# Altium PCB VHF_AMP.PCBDOC (part 1 of 7)
Units mm, origin at the board's own origin, x right, y up, seen from the top; angles counter-clockwise.
Board outline 222.47 x 100.01 mm, 4 copper layers (Top Layer, Int1 (GND), Int2 (PWR), Bottom Layer), stack 1.508 mm thick; 513 components, 284 nets, 1695 pads, 984 vias.
Unrouted connection lines stored in the file: 110.
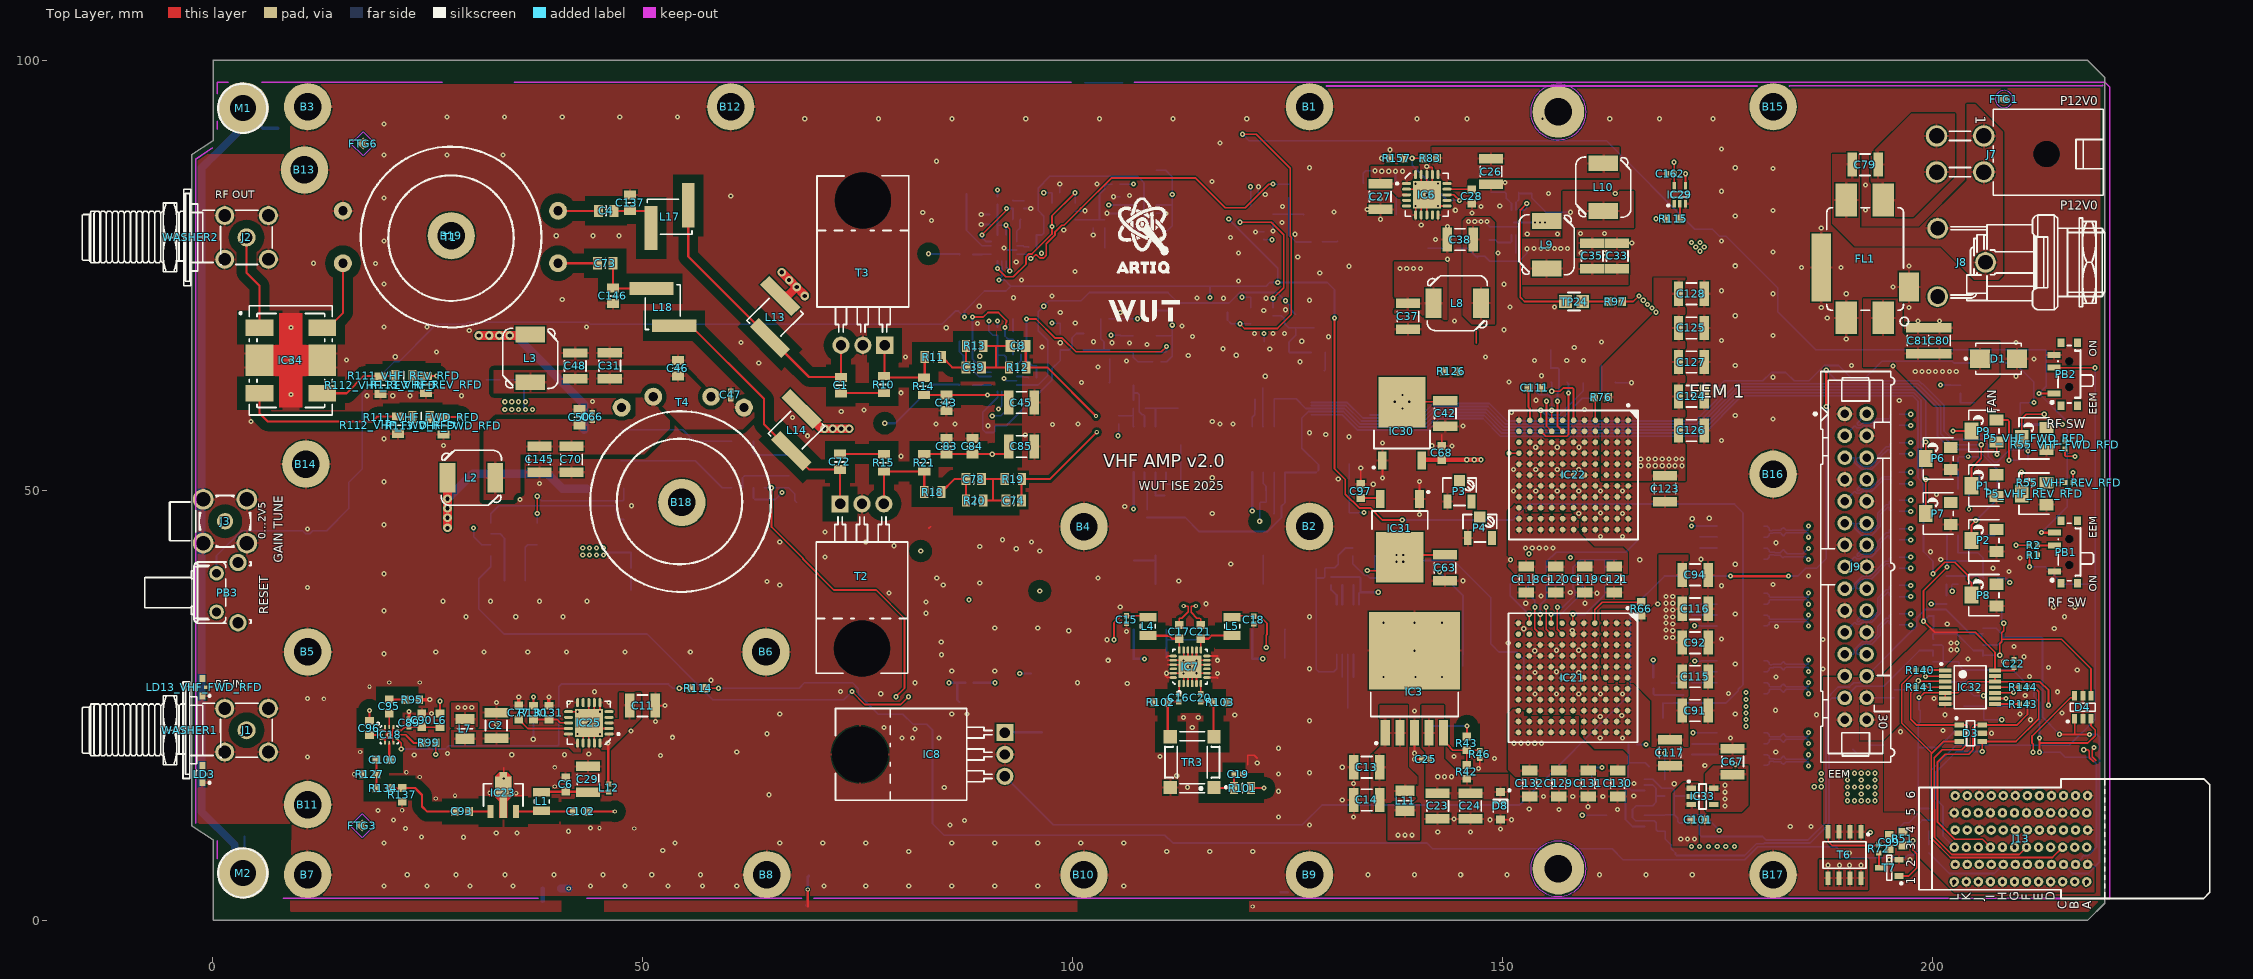
[diagram p0: Top Layer view]
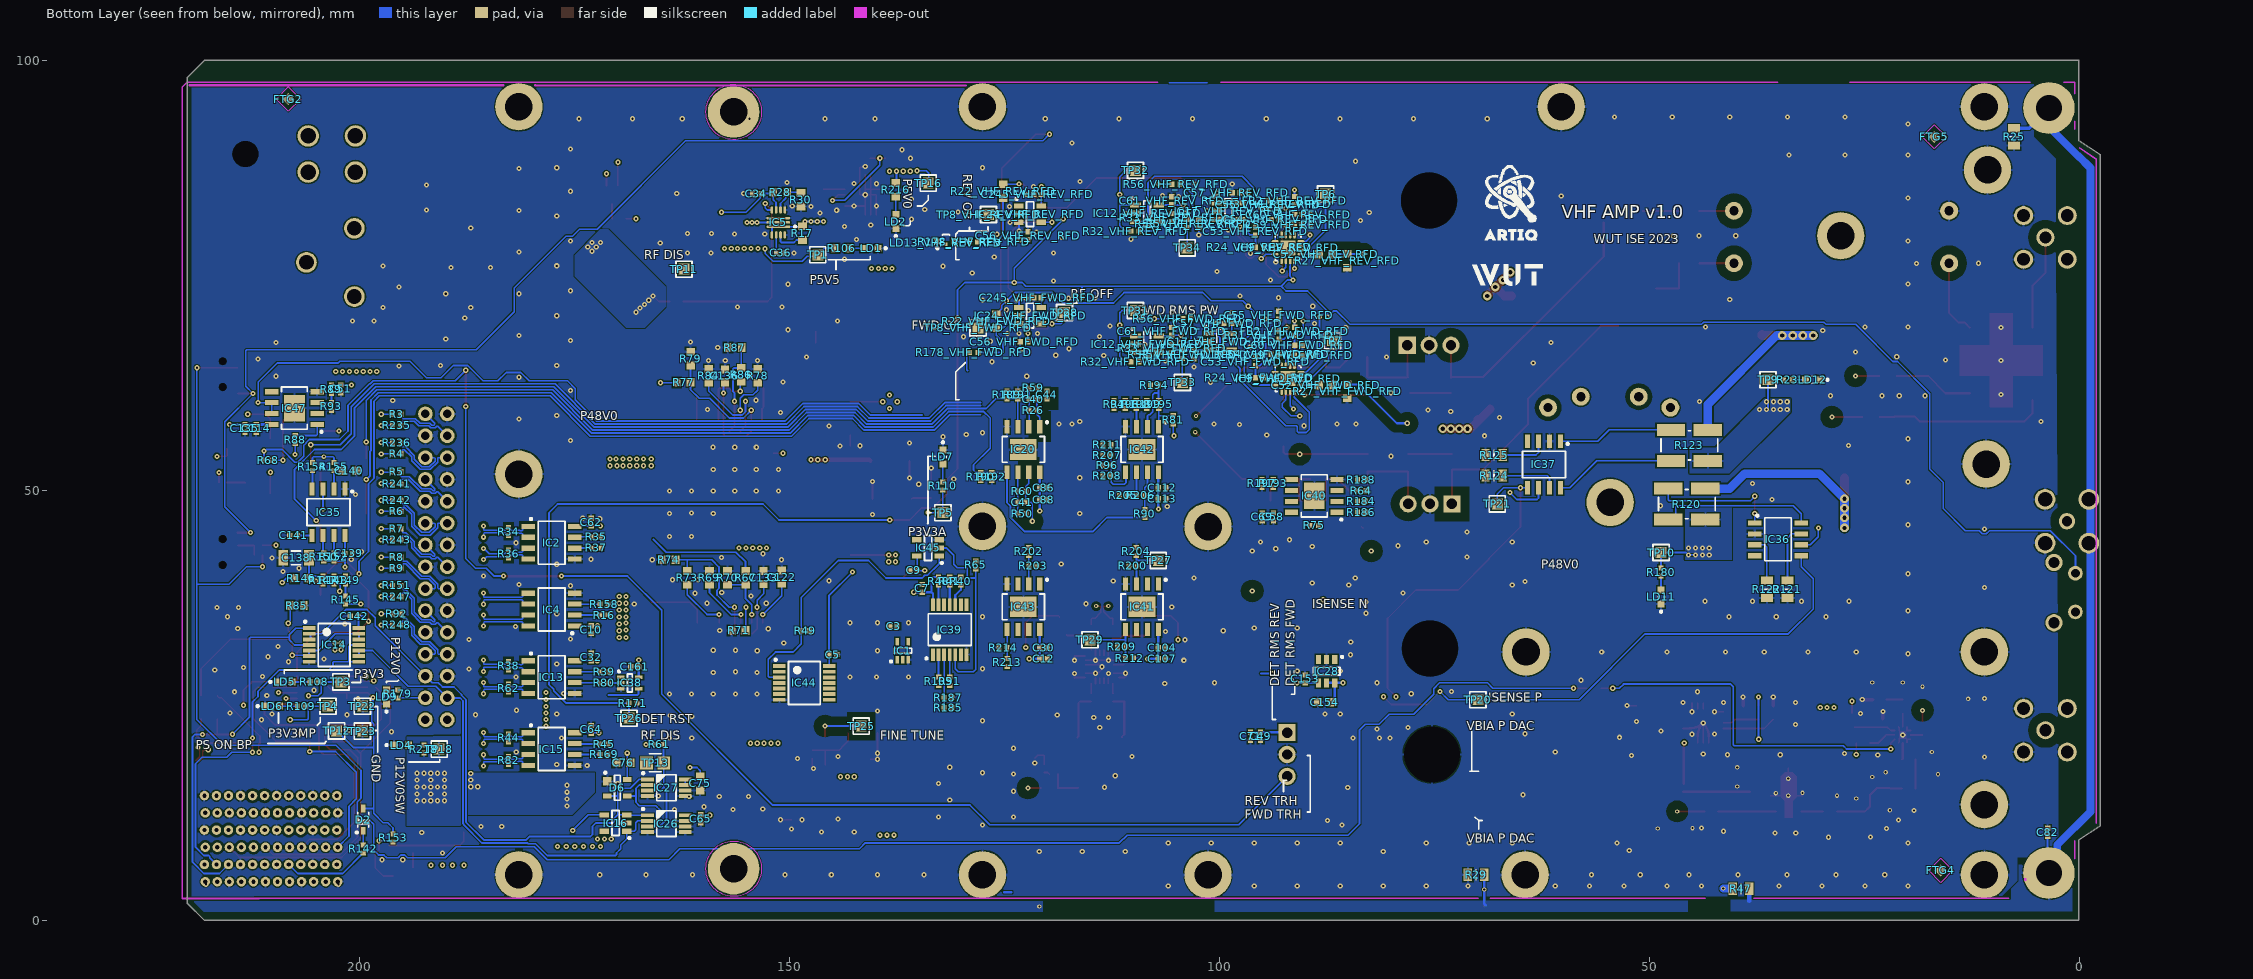
[diagram p1: Bottom Layer view, seen from below]
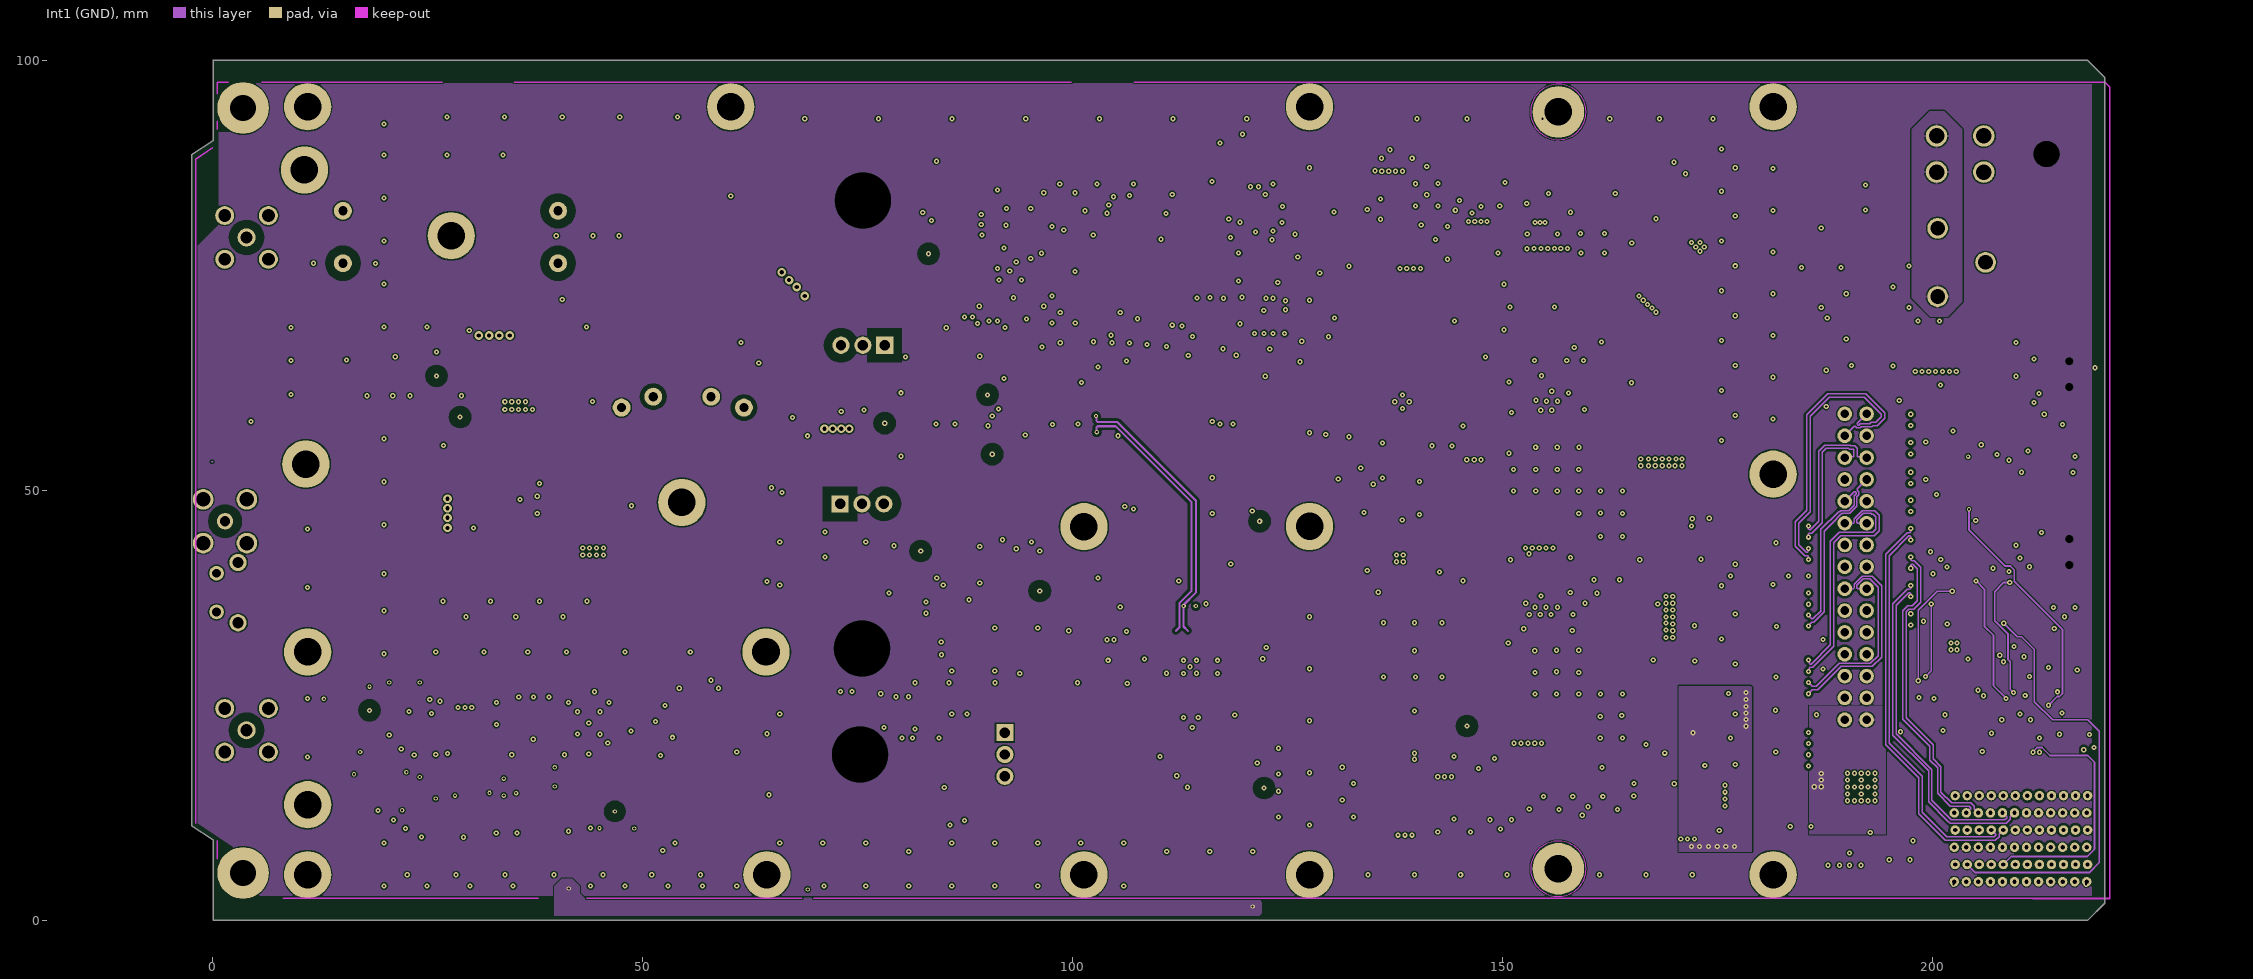
[diagram p2: Int1 (GND)]
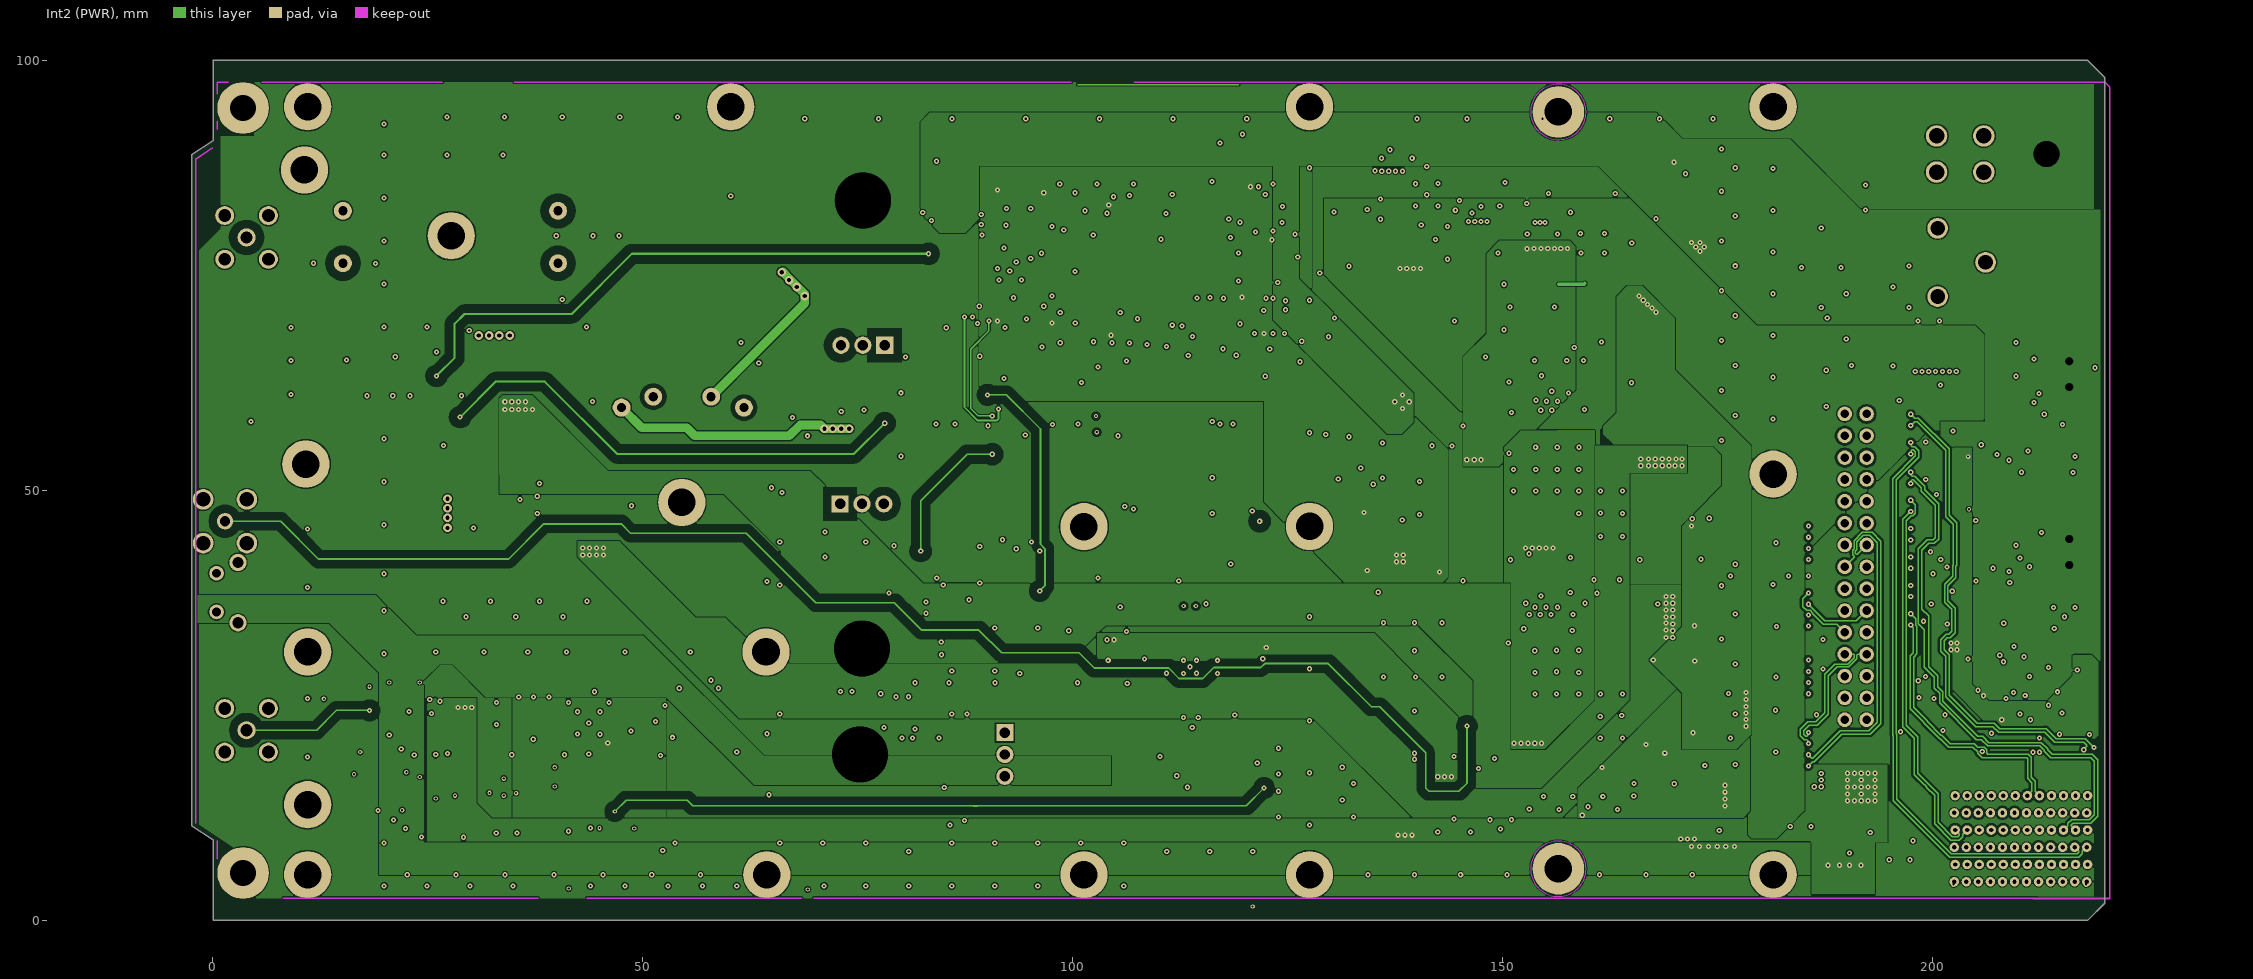
[diagram p3: Int2 (PWR)]
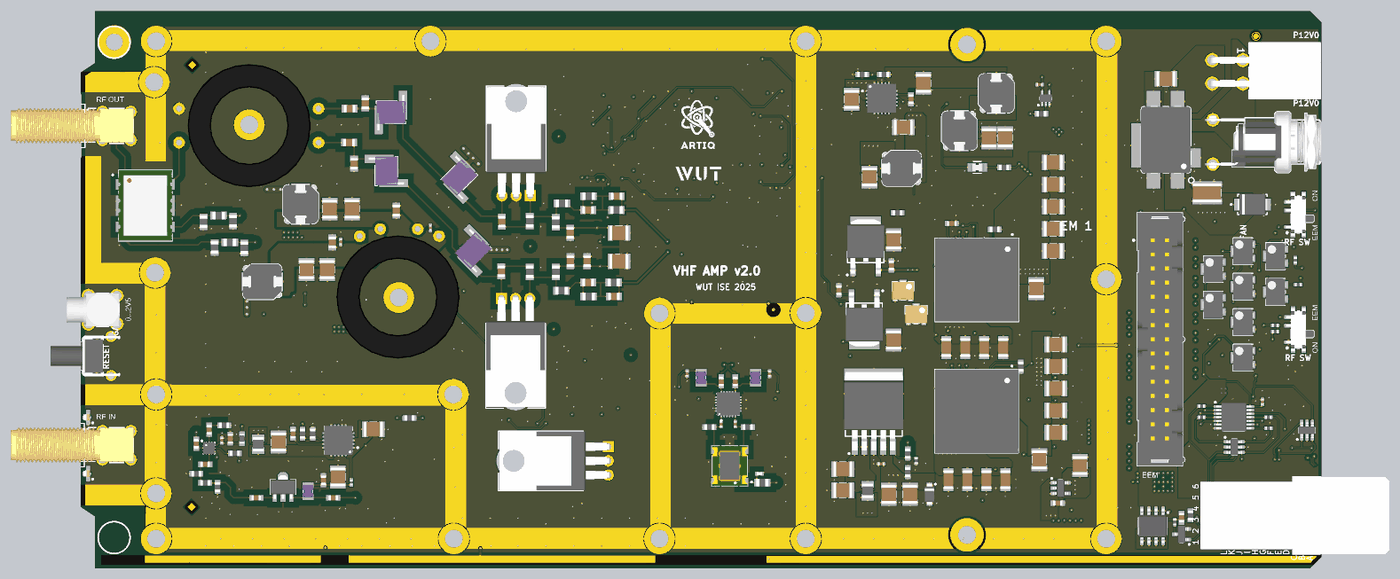
[diagram p8: 3D render of the assembled board from above, using the file's embedded part models]
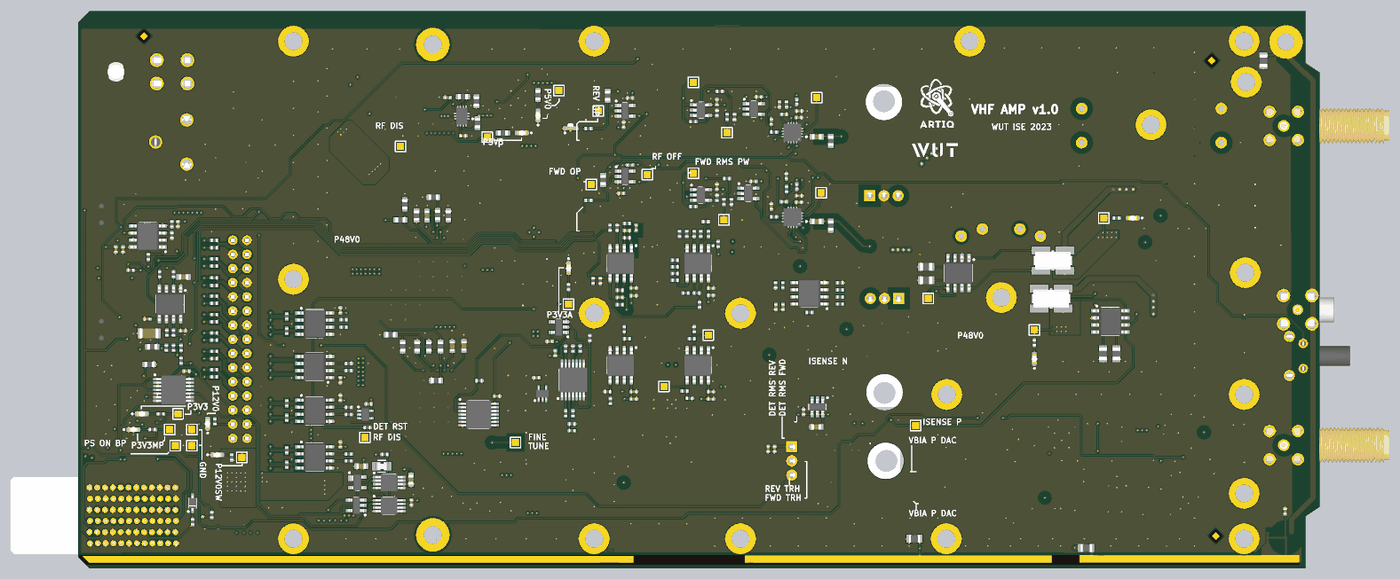
[diagram p9: 3D render of the assembled board from below, using the file's embedded part models]

## Layer stack, top to bottom
Top Solder: solder mask 0.0254, SM-001, Dk 4
Top Layer: signal copper 0.018
Dielectric 1: prepreg 0.068, PP-017, Dk 4.3
Dielectric 2: prepreg 0.068, PP-017, Dk 4.3
Int1 (GND): signal copper 0.035
Dielectric 3: core 1.13, Core-039, Dk 4.6
Int2 (PWR): signal copper 0.035
Dielectric 4: prepreg 0.068, PP-017, Dk 4.3
Dielectric 5: prepreg 0.068, PP-017, Dk 4.3
Bottom Layer: signal copper 0.018
Bottom Solder: solder mask 0.0254, SM-001, Dk 4

## Board outline
-2.4,11 -2.4,89 0.1,90.65 0.1,99.972 0.128,100 218.066,100 218.066,99.993 220.066,97.993 220.066,1.993 218.066,-0.007 218.066,0 0.1,0 0.1,9.35

## Design rules (kind name [scope] priority, off if disabled: settings)
AcuteAngle AcuteAngle_GND [InNet('GND')] p1: minimum=5.00000000000000E+0001 checktracksonly=FALSE
AcuteAngle [All] p2: minimum=5.00000000000000E+0001 checktracksonly=FALSE
BoardOutlineClearance [All] p1: gap=0.5 ignorepadtopadclearanceinfootprint=FALSE
Clearance Clearance_1 [InAnyDifferentialPair] p1: gap=0.15 ignorepadtopadclearanceinfootprint=TRUE except(0: Arc-Hole Track-Hole SMDPad-Hole THPad-Hole Via-Hole Fill-Hole Poly-Hole Region-Hole Text-Hole; 0.3: Arc-Fill Arc-Poly Arc-Region Track-Fill Track-Poly Track-Region SMDPad-Fill SMDPad-Poly SMDPad-Region THPad-Fill THPad-Poly THPad-Region Via-Fill Via-Poly Via-Region Fill-Fill Fill-Poly Fill-Region Poly-Poly Poly-Region Region-Region; 0.6: Via-Via)
Clearance Clearance_50_Ohms_GND_Plane [InNetClass('50_Ohms')] p2: gap=0.2 ignorepadtopadclearanceinfootprint=TRUE except(0: Arc-Hole Track-Hole SMDPad-Hole THPad-Hole Via-Hole Fill-Hole Poly-Hole Region-Hole Text-Hole; 0.5: SMDPad-Fill; 1: Arc-Poly Track-Poly SMDPad-Poly THPad-Fill THPad-Poly THPad-Region Via-Poly Fill-Fill Fill-Poly Fill-Region Poly-Poly Poly-Region Region-Region)
Clearance Clearance_50_Ohms_GND_Plane_2 [InNet('VDD_PA_N')] p3: gap=0.5 ignorepadtopadclearanceinfootprint=TRUE except(0: Arc-Hole Track-Hole SMDPad-Hole THPad-Hole Via-Hole Fill-Hole Poly-Hole Region-Hole Text-Hole; 0.2: Arc-Arc Arc-Track Arc-SMDPad Arc-THPad Arc-Via Track-Track Track-SMDPad Track-THPad Track-Via SMDPad-SMDPad SMDPad-THPad SMDPad-Via THPad-THPad THPad-Via Via-Via)
Clearance Clearance_50_Ohms_GND_Plane_4 [InNet('VDD_PA_P')] p4: gap=0.5 ignorepadtopadclearanceinfootprint=TRUE except(0: Arc-Hole Track-Hole SMDPad-Hole THPad-Hole Via-Hole Fill-Hole Poly-Hole Region-Hole Text-Hole; 0.2: Arc-Arc Arc-Track Arc-SMDPad Arc-THPad Arc-Via Track-Track Track-SMDPad Track-THPad Track-Via SMDPad-SMDPad SMDPad-THPad SMDPad-Via THPad-THPad THPad-Via Via-Via)
Clearance Clearance_50_Ohms_GND_Plane_3 [InNet('P48V0')] p5: gap=0.5 ignorepadtopadclearanceinfootprint=TRUE except(0: Arc-Hole Track-Hole SMDPad-Hole THPad-Hole Via-Hole Fill-Hole Poly-Hole Region-Hole Text-Hole; 0.2: Arc-Arc Arc-Track Arc-SMDPad Arc-THPad Arc-Via Track-Track Track-SMDPad Track-THPad Track-Via SMDPad-SMDPad SMDPad-THPad SMDPad-Via THPad-THPad THPad-Via Via-Via)
Clearance [All] p6: gap=0.15 ignorepadtopadclearanceinfootprint=TRUE except(0: Arc-Hole Track-Hole SMDPad-Hole THPad-Hole Via-Hole Fill-Hole Poly-Hole Region-Hole Text-Hole)
ComponentClearance Clearance_TestPoint [(HasFootprint('TPS127'))] p1: gap=0 collisioncheckmode=3 verticalgap=0 showdistances=FALSE
ComponentClearance Clearance_FrontPanel [InComponentClass('Front Panel')] p2: gap=0 collisioncheckmode=3 verticalgap=0 showdistances=FALSE
ComponentClearance Clearance_ERNI [(HasFootprint('ERMET ZD 3-10 CONNECTOR')) vs (HasFootprint('ERMET ZD 3-10 CONNECTOR'))] p3: gap=0 collisioncheckmode=3 verticalgap=0.254 showdistances=FALSE
ComponentClearance Clearance_Radiall_Placement [HasFootprint('Coaxipack2') vs HasFootprint('Coaxipack2')] p4: gap=0 collisioncheckmode=3 verticalgap=0.254 showdistances=FALSE
ComponentClearance [All] p5: gap=0.254 collisioncheckmode=3 verticalgap=0.254 showdistances=FALSE
DiffPairsRouting [(InDifferentialPairClass('All Differential Pairs'))] p1: maxlimit=0.25 minlimit=0.127 mostfreqgap=0.25 toplayer_mingap=0.15 toplayer_maxgap=0.15 toplayer_prefgap=0.15 toplayer_minwidth=0.15 toplayer_maxwidth=0.152 toplayer_prefwidth=0.15 midlayer1_minwidth=0.127 midlayer1_maxwidth=0.381 midlayer1_prefwidth=0.145 midlayer2_minwidth=0.127 midlayer2_maxwidth=0.381 midlayer2_prefwidth=0.145 bottomlayer_mingap=0.15 bottomlayer_maxgap=0.15 bottomlayer_prefgap=0.15 bottomlayer_minwidth=0.15 bottomlayer_maxwidth=0.152 bottomlayer_prefwidth=0.15 maxuncoupledlength=20
FabricationTestPointUsage TestPointUsage [All] p1: valid=0 allowmultiple=FALSE
FabricationTestpoint Testpoint [(IsPad And (OnTopLayer Or OnBottomLayer))] p1: side=3 testpointundercomponent=TRUE minsize=1.016 maxsize=2.54 preferedsize=1.524 minholesize=0 maxholesize=1.016 preferedholesize=0.813 testpointgrid=0.025 allowsidetop=TRUE allowsidebottom=TRUE usegrid=TRUE gridtolerance=0
Height BottomHeight [All] p1: minheight=0 maxheight=20 prefheight=10
Height TopHeight [OnLayer('Top Layer (LO)')] p2: minheight=0 maxheight=20 prefheight=1
HoleSize [All] p1: absolutevalues=TRUE maxlimit=10 minlimit=0.25 maxpercent=80.000 minpercent=20.000
HoleToHoleClearance [All] p1: gap=0.3 allowstackedmicrovias=TRUE
MinimumAnnularRing [All] p1: minimumring=0.1
MinimumSolderMaskSliver [All] p1: minsoldermaskwidth=0
PlaneClearance [All] p1: clearance=0.25
PlaneConnect PlaneConnect_pad [InPadClass('All Pads')] p1: planeconnectstyle=Relief reliefexpansion=0.508 reliefentries=4 reliefconductorwidth=0.254 reliefairgap=0.254
PlaneConnect [All] p2: planeconnectstyle=Direct reliefexpansion=0.508 reliefentries=4 reliefconductorwidth=0.254 reliefairgap=0.254
PolygonConnect PolygonConnect_pad [IsPad] p1: connectstyle=Relief reliefconductorwidth=0.3 reliefentries=4 polygonreliefangle="90 Angle" airgapwidth=0.152
PolygonConnect [All] p2: connectstyle=Direct reliefconductorwidth=0.254 reliefentries=4 polygonreliefangle="90 Angle" airgapwidth=0.254
RoomDefinition U_BIAS_control [InComponentClass('U_BIAS_control')] p1: confinementstyle=ConfineIn formatcopy=TRUE lockcomponents=FALSE outline -101.6,-152.4 -50.8,-152.4 -50.8,-127 -101.6,-127
RoomDefinition VHF_REV_RFD [InComponentClass('VHF_REV_RFD')] p2: confinementstyle=ConfineIn formatcopy=TRUE lockcomponents=FALSE outline -101.6,-152.4 -50.8,-152.4 -50.8,-127 -101.6,-127
RoomDefinition VHF_FWD_RFD [InComponentClass('VHF_FWD_RFD')] p3: confinementstyle=ConfineIn formatcopy=TRUE lockcomponents=FALSE outline -101.6,-152.4 -50.8,-152.4 -50.8,-127 -101.6,-127
RoomDefinition U_PWR_stage [InComponentClass('U_PWR_stage')] p4: confinementstyle=ConfineIn formatcopy=TRUE lockcomponents=FALSE outline -101.6,-152.4 -50.8,-152.4 -50.8,-127 -101.6,-127
RoomDefinition U_Preamp [InComponentClass('U_Preamp')] p5: confinementstyle=ConfineIn formatcopy=TRUE lockcomponents=FALSE outline -101.6,-152.4 -50.8,-152.4 -50.8,-127 -101.6,-127
RoomDefinition Overlapping [InComponentClass('Overlapping')] p6: confinementstyle=ConfineIn formatcopy=TRUE lockcomponents=FALSE outline -101.6,-152.4 -50.8,-152.4 -50.8,-127 -101.6,-127
RoutingVias [All] p1: holewidth=0.3 width=0.6 viastyle="Through Hole" minholewidth=0.25 minwidth=0.5 maxholewidth=0.45 maxwidth=0.7 useviatemplates=TRUE viatemplateguid#1={7CF83291-E049-4274-91F9-973C0FDF1236} viatemplatename#1=v60h25m0
SMDToCorner [All] p1: distance=0
SilkToSilkClearance [All] p1: silktosilkclearance=0
SilkToSolderMaskClearance [IsPad] p1: minsilkscreentomaskgap=0 clearancetoexposedcopper=TRUE
SolderMaskExpansion SolderMaskExpansion_GND_VIA [IsVia AND InNet('GND')] p1: expansion=-0.1 istentingtop=FALSE
SolderMaskExpansion [All] p2: expansion=0.05 istentingtop=FALSE
SupplyNets "Schematic Supply Nets_11" [InNet('STRIP1')] p1: voltage=0.000
SupplyNets "Schematic Supply Nets_13" [InNet('VCC')] p2: voltage=0.000
SupplyNets "Schematic Supply Nets_16" [InNet('P48V0_P')] p3: voltage=0.000
SupplyNets "Schematic Supply Nets_14" [InNet('P5V0A')] p4: voltage=0.000
SupplyNets "Schematic Supply Nets_12" [InNet('P48V0_N')] p5: voltage=0.000
SupplyNets "Schematic Supply Nets_10" [InNet('P5V5A')] p6: voltage=0.000
SupplyNets "Schematic Supply Nets_9" [InNet('P3V3')] p7: voltage=0.000
SupplyNets "Schematic Supply Nets_8" [InNet('P5V5')] p8: voltage=0.000
SupplyNets "Schematic Supply Nets_7" [InNet('P12V0_SW')] p9: voltage=0.000
SupplyNets "Schematic Supply Nets_6" [InNet('P12V0F')] p10: voltage=0.000
SupplyNets "Schematic Supply Nets_5" [InNet('P3V3_MP')] p11: voltage=0.000
SupplyNets "Schematic Supply Nets_4" [InNet('P12V0')] p12: voltage=0.000
SupplyNets "Schematic Supply Nets_3" [InNet('P3V3A')] p13: voltage=0.000
SupplyNets "Schematic Supply Nets_2" [InNet('GND')] p14: voltage=0.000
SupplyNets "Schematic Supply Nets" [InNet('P2V5REF')] p15: voltage=0.000
Width 50_Ohm_Lines [InNetClass('50_Ohms')] p1: maxlimit=0.64 minlimit=0.15 preferedwidth=0.245 toplayer_minwidth=0.2 midlayer1_prefwidth=0.159 midlayer2_prefwidth=0.159 bottomlayer_minwidth=0.2 impedanceprofiledriven=TRUE impedanceprofileid={9B9D37AF-A14F-459B-B6CC-C7E752EA910A} impedanceprofilevalue=50.000000 minimp=45.000000 maximp=55.000000 favimp=50.000000
Width [All] p2: maxlimit=10 minlimit=0.15 preferedwidth=0.2
18 further rules are at their usual default settings.

## Classes and differential pairs
component class U_DACs: TP20 TP21 TP27 TP29 TP31 TP32 TP33 TP34
component class U_BIAS_control: C3 C7 C9 C12 C30 C40 C41 C49 C51 C58 C69 C71 C86 C88 C104 C107 C112 C113 C114 C135 IC1 IC8 IC20 IC39 IC40 IC41 IC42 IC43 IC45 IC47 LD3 P1 P2 P6 P7 P8 P9 R26 R40 R41 R48 R50 R59 R60 R64 R65 R68 R75 R81 R88 R89 R90 R91 R93 R94 R96 R105 R184 R185 R186 R187 R188 R189 R190 R191 R192 R193 R194 R195 R196 R197 R198 R199 R200 R202 R203 R204 R205 R206 R207 R208 R209 R211 R212 R213 R214
net class ESD_STRIP: STRIP1 STRIP2 STRIP3
component class VHF_REV_RFD: C52_VHF_REV_RFD C53_VHF_REV_RFD C54_VHF_REV_RFD C55_VHF_REV_RFD C56_VHF_REV_RFD C57_VHF_REV_RFD C59_VHF_REV_RFD C60_VHF_REV_RFD C61_VHF_REV_RFD C245_VHF_REV_RFD FB2_VHF_REV_RFD IC9_VHF_REV_RFD IC12_VHF_REV_RFD IC17_VHF_REV_RFD IC24_VHF_REV_RFD LD13_VHF_REV_RFD P5_VHF_REV_RFD R22_VHF_REV_RFD R24_VHF_REV_RFD R27_VHF_REV_RFD R31_VHF_REV_RFD R32_VHF_REV_RFD R33_VHF_REV_RFD R53_VHF_REV_RFD R54_VHF_REV_RFD R55_VHF_REV_RFD R56_VHF_REV_RFD R111_VHF_REV_RFD R112_VHF_REV_RFD R113_VHF_REV_RFD R178_VHF_REV_RFD TP8_VHF_REV_RFD
component class VHF_FWD_RFD: C52_VHF_FWD_RFD C53_VHF_FWD_RFD C54_VHF_FWD_RFD C55_VHF_FWD_RFD C56_VHF_FWD_RFD C57_VHF_FWD_RFD C59_VHF_FWD_RFD C60_VHF_FWD_RFD C61_VHF_FWD_RFD C245_VHF_FWD_RFD FB2_VHF_FWD_RFD IC9_VHF_FWD_RFD IC12_VHF_FWD_RFD IC17_VHF_FWD_RFD IC24_VHF_FWD_RFD LD13_VHF_FWD_RFD P5_VHF_FWD_RFD R22_VHF_FWD_RFD R24_VHF_FWD_RFD R27_VHF_FWD_RFD R31_VHF_FWD_RFD R32_VHF_FWD_RFD R33_VHF_FWD_RFD R53_VHF_FWD_RFD R54_VHF_FWD_RFD R55_VHF_FWD_RFD R56_VHF_FWD_RFD R111_VHF_FWD_RFD R112_VHF_FWD_RFD R113_VHF_FWD_RFD R178_VHF_FWD_RFD TP8_VHF_FWD_RFD
channel class VHFA_RF_detector: VHF_FWD_RFD VHF_REV_RFD
net class PWR: NetC79_2 P3V3 P3V3A P5V0A P5V5 P12V0 P12V0_SW P12V0F
net class 50_Ohms: FINE_TUNE_0V_P2V5 NetC1_1 NetC1_2 NetC4_1 NetC4_2 NetC8_2 NetC16_1 NetC16_2 NetC17_1 NetC19_2 NetC20_1 NetC20_2 NetC21_1 NetC39_2 NetC52_VHF_FWD_RFD_1 NetC52_VHF_REV_RFD_1 NetC72_1 NetC72_2 NetC73_1 NetC73_2 NetC74_2 NetC78_2 NetC93_1 NetC93_2 NetC95_1 NetC95_2 NetC96_1 NetC96_2 NetC100_1 NetC100_2 NetC102_1 NetC102_2 NetIC34_1 NetIC34_4 NetIC34_5 NetIC34_8 NetR10_1 NetR15_1 RF_IN_N RF_IN_P Vbias_N Vbias_P
component class Overlapping: J13
differential pair class EEM0: LVDS0 LVDS1 LVDS2 LVDS3 LVDS4 LVDS5 LVDS6 LVDS7
net class highPower: P12V0_SW
net class EEM0: LVDS0_N LVDS0_P LVDS1_N LVDS1_P LVDS2_N LVDS2_P LVDS3_N LVDS3_P LVDS4_N LVDS4_P LVDS5_N LVDS5_P LVDS6_N LVDS6_P LVDS7_N LVDS7_P
component class U_PWR_stage: C1 C4 C8 C31 C39 C43 C44 C45 C46 C47 C48 C50 C66 C70 C72 C73 C74 C78 C83 C84 C85 C137 C145 C146 IC34 IC36 IC37 L2 L3 L13 L14 L17 L18 R10 R11 R12 R13 R14 R15 R18 R19 R20 R21 R120 R121 R122 R123 R124 R125 T1 T2 T3 T4
net class BP_IO.LVDS_P[0..7]: BP_IO.LVDS_P0 BP_IO.LVDS_P1 BP_IO.LVDS_P2 BP_IO.LVDS_P3 BP_IO.LVDS_P4 BP_IO.LVDS_P5 BP_IO.LVDS_P6 BP_IO.LVDS_P7
net class BP_IO.LVDS_N[0..7]: BP_IO.LVDS_N0 BP_IO.LVDS_N1 BP_IO.LVDS_N2 BP_IO.LVDS_N3 BP_IO.LVDS_N4 BP_IO.LVDS_N5 BP_IO.LVDS_N6 BP_IO.LVDS_N7
component class U_Preamp: C2 C6 C11 C29 C77 C93 C102 IC23 IC25 L1 L7 L12 R127 R130 R131 R134 R137
differential pair RF_IN: +RF_IN_P -RF_IN_N
differential pair BP_IO.LVDS4: +BP_IO.LVDS_P4 -BP_IO.LVDS_N4
differential pair BP_IO.LVDS3: +BP_IO.LVDS_P3 -BP_IO.LVDS_N3
differential pair BP_IO.LVDS2: +BP_IO.LVDS_P2 -BP_IO.LVDS_N2
differential pair BP_IO.LVDS1: +BP_IO.LVDS_P1 -BP_IO.LVDS_N1
differential pair BP_IO.LVDS0: +BP_IO.LVDS_P0 -BP_IO.LVDS_N0
differential pair BP_IO.LVDS7: +BP_IO.LVDS_P7 -BP_IO.LVDS_N7
differential pair BP_IO.LVDS6: +BP_IO.LVDS_P6 -BP_IO.LVDS_N6
differential pair BP_IO.LVDS5: +BP_IO.LVDS_P5 -BP_IO.LVDS_N5
differential pair LVDS7: +LVDS7_P -LVDS7_N
differential pair LVDS6: +LVDS6_P -LVDS6_N
differential pair LVDS5: +LVDS5_P -LVDS5_N
differential pair LVDS4: +LVDS4_P -LVDS4_N
differential pair LVDS3: +LVDS3_P -LVDS3_N
differential pair LVDS2: +LVDS2_P -LVDS2_N
differential pair LVDS1: +LVDS1_P -LVDS1_N
differential pair LVDS0: +LVDS0_P -LVDS0_N

## Components (designator, comment, footprint, x,y, rotation, side; value= is the part's Value field where it differs from the comment)
B1 "Plated Hole" MTG320_550 127.6,94.6 r0 top
B2 "Plated Hole" MTG320_550 127.6,45.8 r0 top
B3 "Plated Hole" MTG320_550 11.1,94.6 r0 top
B4 "Plated Hole" MTG320_550 101.37,45.77 r0 top
B5 "Plated Hole" MTG320_550 11.1,31.2 r0 top
B6 "Plated Hole" MTG320_550 64.4,31.2 r0 top
B7 "Plated Hole" MTG320_550 11.1,5.3 r0 top
B8 "Plated Hole" MTG320_550 64.5,5.3 r0 top
B9 "Plated Hole" MTG320_550 127.6,5.3 r0 top
B10 "Plated Hole" MTG320_550 101.37,5.3 r0 top
B11 "Plated Hole" MTG320_550 11.1,13.45 r0 top
B12 "Plated Hole" MTG320_550 60.3,94.6 r0 top
B13 "Plated Hole" MTG320_550 10.735,87.25 r0 top
B14 "Plated Hole" MTG320_550 10.9,53.05 r0 top
B15 "Plated Hole" MTG320_550 181.5,94.6 r0 top
B16 "Plated Hole" MTG320_550 181.5,51.88 r0 top
B17 "Plated Hole" MTG320_550 181.5,5.3 r0 top
B18 "Plated Hole" MTG320_550 54.614,48.588 r0 top
B19 "Plated Hole" MTG320_550 27.8,79.6 r0 top
C1 "100pF" CAPC2012X135N 73.1,62.2 r90 top
C2 "10uF" CAPC3225X280N 33.043,22.659 r270 top
C3 "100nF" CAPC1005X55N 137.94,34.2 r180 bottom
C4 "1nF" CAPC2012X135N 45.8,82.496 r180 top
C5 "100nF" CAPC1005X55N 145,30.9 r0 bottom
C6 "10nF" CAPC1608X87N 41.1,15.8 r270 top
C7 "100nF" CAPC1005X55N 134.6,38.6 r270 bottom
C8 "220pF" CAPC2012X135N 93.7,66.8 r180 top
C9 "100nF" CAPC1005X55N 135.6,40.7 r0 bottom
C10 "100nF" CAPC1005X55N 173.1,33.8 r90 bottom
C11 "10uF" CAPC3225X280N 50.043,24.959 r180 top
C12 "1nF" CAPC1005X55N 120.5,30.4 r0 bottom
C13 "10uF" CAPC3225X280N 134.25,17.8 r0 top
C14 "10uF" CAPC3225X280N 134.25,14 r0 top
C15 "10nF" CAPC1005X55N 106.32,34.963 r90 top
C16 "220pF" CAPC1005X55N 112.408,25.88 r90 top
C17 "10nF" CAPC1608X87N 112.458,33.54 r90 top
C18 "10nF" CAPC1005X55N 121.095,34.92 r90 top
C19 "0.5pF" CAPC1005X50N 119.308,16.98 r180 top
C20 "220pF" CAPC1005X55N 114.958,25.88 r90 top
C21 "10nF" CAPC1608X87N 114.958,33.54 r90 top
C22 "100nF" CAPC1005X55N 209.5,29.85 r270 top
C23 "10uF" CAPC3225X280N 142.5,13.3 r90 top
C24 "10uF" CAPC3225X280N 146.3,13.3 r90 top
C25 "100nF" CAPC1005X55N 141.1,18.73 r180 top
C26 "10uF" CAPC3225X280N 148.7,87.064 r90 top
C27 "10uF" CAPC3225X280N 135.832,84.154 r90 top
C28 "" CAPC1608X87N 146.475,84.181 r90 top value=1uF
C29 "10uF" CAPC3225X280N 43.7,16.4 r270 top
C30 "100nF" CAPC1005X55N 120.5,31.7 r0 bottom
C31 "10uF" CAPC3225X280N 46.228,64.481 r270 top
C32 "100nF" CAPC1005X55N 173.1,30.6 r270 bottom
C33 "10uF" CAPC3225X280N 163.366,77.247 r270 top
C34 "100nF" CAPC1005X55N 153.88,84.499 r180 bottom
C35 "10uF" CAPC3225X280N 160.466,77.247 r270 top
C36 "100nF" CAPC1005X55N 151.08,77.6 r180 bottom
C37 "10uF" CAPC3225X280N 139.032,70.223 r90 top
C38 "10uF" CAPC3225X280N 145.112,79.15 r0 top
C39 "220pF" CAPC2012X135N 88.56,64.296 r180 top
C40 "10nF" CAPC1005X55N 121.7,60.6 r180 bottom
C41 "10nF" CAPC1005X55N 123,48.6 r180 bottom
C42 "10uF" CAPC3225X280N 143.377,58.934 r90 top
C43 "1nF" CAPC2012X135N 85.36,60.196 r90 top
C44 "100nF" CAPC1005X55N 120.1,61.1 r270 bottom
C45 "10uF" CAPC3225X280N 94.1,60.2 r180 top
C46 "" CAPC2012X135N 54.16,64.2 r270 top value=1nF
C47 "100nF" CAPC1005X55N 60.3,61.096 r270 top
C48 "10uF" CAPC3225X280N 42.219,64.466 r270 top
C49 "1nF" CAPC1005X55N 95.26,21.4 r90 bottom
C50 "" CAPC2012X135N 42.7,58.5 r270 top value=1nF
C51 "100nF" CAPC1005X55N 202.2,61.8 r90 bottom
C52_VHF_FWD_RFD "2.2nF" CAPC1608X87N 87.7,62.239 r0 bottom (schematic designator C52)
C52_VHF_REV_RFD "2.2nF" CAPC1608X87N 87.7,77.439 r0 bottom (schematic designator C52)
C53_VHF_FWD_RFD "10nF" CAPC1005X55N 95.857,64.944 r270 bottom (schematic designator C53)
C53_VHF_REV_RFD "10nF" CAPC1005X55N 95.857,80.144 r270 bottom (schematic designator C53)
C54_VHF_FWD_RFD "1nF" CAPC1005X55N 93.6,65.8 r0 bottom (schematic designator C54)
C54_VHF_REV_RFD "1nF" CAPC1005X55N 93.544,81.489 r0 bottom (schematic designator C54)
C55_VHF_FWD_RFD "" CAPC1005X55N 93.157,70.374 r90 bottom value=100nF (schematic designator C55)
C55_VHF_REV_RFD "" CAPC1005X55N 94.4,83.224 r270 bottom value=100nF (schematic designator C55)
C56_VHF_FWD_RFD "100nF" CAPC1005X55N 122.766,67.276 r180 bottom (schematic designator C56)
C56_VHF_REV_RFD "100nF" CAPC1005X55N 122.306,79.6 r270 bottom (schematic designator C56)
C57_VHF_FWD_RFD "100nF" CAPC1005X55N 99.068,69.436 r180 bottom (schematic designator C57)
C57_VHF_REV_RFD "100nF" CAPC1005X55N 98.1,84.6 r180 bottom (schematic designator C57)
C58 "1nF" CAPC1005X55N 93.76,46.91 r90 bottom
C59_VHF_FWD_RFD "100pF" CAPC1005X55N 90.9,65.7 r0 bottom (schematic designator C59)
C59_VHF_REV_RFD "100pF" CAPC1005X55N 90.9,80.9 r0 bottom (schematic designator C59)
C60_VHF_FWD_RFD "" CAPC1005X55N 90.856,66.861 r180 bottom value=100nF (schematic designator C60)
C60_VHF_REV_RFD "" CAPC1005X55N 90.856,82.061 r180 bottom value=100nF (schematic designator C60)
C61_VHF_FWD_RFD "100nF" CAPC1005X55N 105.595,68.474 r270 bottom (schematic designator C61)
C61_VHF_REV_RFD "100nF" CAPC1005X55N 105.595,83.674 r270 bottom (schematic designator C61)
C62 "100nF" CAPC1005X55N 173.1,46.3 r270 bottom
C63 "10uF" CAPC3225X280N 143.362,40.984 r90 top
C64 "100nF" CAPC1005X55N 173.1,22.2 r270 bottom
C65 "100nF" CAPC1005X55N 160.354,11.812 r90 bottom
C66 "100nF" CAPC1005X55N 44.2,58.573 r270 top
C67 "10uF" CAPC3225X280N 176.798,18.442 r270 top
C68 "" CAPC1608X87N 142.98,54.36 r270 top value=1uF
C69 "100nF" CAPC1005X55N 95.06,46.91 r90 bottom
C70 "10uF" CAPC3225X280N 41.774,53.603 r90 top
C71 "100nF" CAPC1005X55N 96.43,21.4 r90 bottom
C72 "100pF" CAPC2012X135N 73,53.3 r270 top
C73 "1nF" CAPC2012X135N 45.7,76.4 r180 top
C74 "220pF" CAPC2012X135N 93.195,48.796 r180 top
C75 "1uF" CAPC1608X87N 160.426,15.912 r90 bottom
C76 "1uF" CAPC1608X87N 169.353,18.312 r180 bottom
C77 "1uF" CAPC1608X87N 35.643,24.159 r270 top
C78 "220pF" CAPC2012X135N 88.56,51.296 r180 top
C79 "10uF" CAPC3225X280N 192.2,87.861 r0 top
C80 "10uF" CAPC3225X280N 200.845,67.4 r270 top
C81 "10uF" CAPC3225X280N 198.349,67.4 r270 top
C82 "22pF" CAPC1005X55N 3.75,10.237 r90 bottom
C83 "1nF" CAPC2012X135N 85.4,55.1 r270 top
C84 "1nF" CAPC2012X135N 88.4,55.1 r270 top
C85 "10uF" CAPC3225X280N 94.1,55.1 r180 top
C86 "1nF" CAPC1005X55N 120.494,50.311 r0 bottom
C88 "100nF" CAPC1005X55N 120.5,48.9 r0 bottom
C89 "100nF" CAPC1005X55N 22.893,22.964 r270 top
C90 "4.7uF" CAPC1709X95N 24.393,23.264 r270 top
C91 "10uF" CAPC3225X280N 172.442,24.39 r180 top
C92 "10uF" CAPC3225X280N 172.442,32.282 r180 top
C93 "10nF" CAPC1608X87N 29.051,12.656 r0 top
C94 "10uF" CAPC3225X280N 172.442,40.173 r180 top
C95 "10nF" CAPC1608X87N 20.593,24.864 r90 top
C96 "10nF" CAPC1608X87N 18.293,22.359 r270 top
C97 "" CAPC1608X87N 133.55,49.9 r270 top value=1uF
C99 "" CAPC1608X87N 195,9.1 r90 top value=1uF
C100 "10nF" CAPC1608X87N 19.893,18.664 r180 top
C101 "" CAPC1608X87N 172.8,11.7 r180 top value=1uF
C102 "10nF" CAPC1608X87N 42.867,12.656 r0 top
C104 "1nF" CAPC1005X55N 106.7,31.7 r0 bottom
C107 "100nF" CAPC1005X55N 106.7,30.4 r0 bottom
C111 "Undefined" CAPC1608X90N 153.81,61.9 r180 top
C112 "1nF" CAPC1005X55N 106.7,50.301 r0 bottom
C113 "100nF" CAPC1005X55N 106.7,49 r0 bottom
C114 "1nF" CAPC1005X55N 212.046,57.205 r90 bottom
C115 "10uF" CAPC3225X280N 172.442,28.336 r180 top
C116 "10uF" CAPC3225X280N 172.442,36.227 r180 top
C117 "10uF" CAPC3225X280N 169.503,19.495 r90 top
C118 "2.2uF" CAPC3216X180N 152.79,39.634 r90 top
C119 "2.2uF" CAPC3216X180N 159.61,39.634 r90 top
C120 "2.2uF" CAPC3216X180N 156.2,39.634 r90 top
C121 "2.2uF" CAPC3216X180N 163.02,39.634 r90 top
C122 "Undefined" CAPC1608X90N 150.94,39.91 r270 bottom
C123 "10uF" CAPC3225X280N 168.942,50.188 r90 top
C124 "10uF" CAPC3225X280N 171.997,60.928 r180 top
C125 "10uF" CAPC3225X280N 171.997,68.876 r180 top
C126 "10uF" CAPC3225X280N 171.997,56.954 r180 top
C127 "10uF" CAPC3225X280N 171.997,64.902 r180 top
C128 "10uF" CAPC3225X280N 171.997,72.85 r180 top
C129 "2.2uF" CAPC3216X180N 156.59,15.91 r90 top
C130 "2.2uF" CAPC3216X180N 163.41,15.91 r90 top
C131 "2.2uF" CAPC3216X180N 160,15.91 r90 top
C132 "2.2uF" CAPC3216X180N 153.18,15.91 r90 top
C133 "Undefined" CAPC1608X90N 153.04,39.86 r270 bottom
C135 "100nF" CAPC1005X55N 213.347,57.205 r90 bottom
C136 "Undefined" CAPC1608X90N 157.54,63.31 r270 bottom
C137 "220pF" CAPC2012X135N 48.608,83.44 r270 top
C138 "22uF" CAPC3216X180N 207.401,42.153 r180 bottom
C139 "100nF" CAPC1005X55N 201.301,42.653 r0 bottom
C140 "1uF" CAPC1608X87N 201.201,52.283 r0 bottom
C141 "100nF" CAPC1005X55N 207.701,44.753 r180 bottom
C142 "100nF" CAPC1005X55N 200.655,35.378 r180 bottom
C145 "10uF" CAPC3225X280N 38.067,53.603 r90 top
C146 "220pF" CAPC2012X135N 46.6,72.6 r90 top
C153 "100nF" CAPC1005X55N 90.083,28.068 r90 bottom
C154 "" CAPC1608X87N 87.783,25.368 r180 bottom value=1uF
C161 "100nF" CAPC1005X55N 168.031,29.48 r180 bottom
C162 "100nF" CAPC1005X55N 169.565,86.809 r0 top
C245_VHF_FWD_RFD "100nF" CAPC1005X55N 121.2,72.4 r0 bottom (schematic designator C245)
C245_VHF_REV_RFD "100nF" CAPC1005X55N 121.2,84.4 r0 bottom (schematic designator C245)
D1 "SMBJ12A" DIOM5336X265N 207.7,65.3 r0 top
D2 "BAT165" SOD2512X110N 199.6,11.7 r90 bottom
D3 "PESD3V3S4UD" SOT95P280X110-6N 204.47,21.75 r0 top
D4 "PESD3V3S4UD" SOT95P280X110-6N 217.513,24.773 r90 top
D6 "PRTR5V0U2X" SOT190P230X110-4N 170.053,15.412 r180 bottom
D8 "PMEG6020ER" SODFL3517X110N 149.8,13.3 r270 top
FB2_VHF_FWD_RFD "220R@100MHz" INDC1005X55N 91.306,68.496 r270 bottom (schematic designator FB2)
FB2_VHF_REV_RFD "220R@100MHz" INDC1005X55N 91.306,83.696 r270 bottom (schematic designator FB2)
FL1 "10A/50VDC" FIL_MURATA_BNX02 192.2,76.9 r270 top
FTG1 "Use only in PCB" FIDUCIAL_TOP_C100-200 208.352,95.493 r90 top
FTG2 "Use only in PCB" FIDUCIAL_TOP_S100-200 208.302,95.493 r90 bottom
FTG3 "Use only in PCB" FIDUCIAL_TOP_S100-200 17.45,11 r90 top
FTG4 "Use only in PCB" FIDUCIAL_TOP_S100-200 16.177,5.793 r90 bottom
FTG5 "Use only in PCB" FIDUCIAL_TOP_S100-200 16.906,91.099 r90 bottom
FTG6 "Use only in PCB" FIDUCIAL_TOP_S100-200 17.55,90.3 r90 top
IC1 "74LVC1GU04GW" SOT65P212X110-5N 136.877,31.35 r90 bottom
IC2 "FIN1028MX" SOIC127P600X175-8N 177.7,43.9 r180 bottom
IC3 "LT1963EQ#PBF" TO170P1394X457-6N-R900X1060 139.8,28.1 r90 top
IC4 "FIN1027AMX" SOIC127P600X175-8N 177.7,36.131 r0 bottom
IC5 "TPS62148RGX" TEXAS_RGX0011A 151.33,81.147 r0 bottom
IC6 "TPS7A4700RGWT" QFN65P500X500X100-21N-S325 141.232,84.364 r0 top
IC7 "MPGA-152" QFN50P400X400X100-25N-S265 113.708,29.48 r90 top
IC8 "LM35DT/NOPB" TO-220-HFLIP 92.172,19.283 r90 top
IC9_VHF_FWD_RFD "ADL5904ACPZN-R7" QFN50P300X300X80-17N-S175 92.069,62.989 r0 bottom (schematic designator IC9)
IC9_VHF_REV_RFD "ADL5904ACPZN-R7" QFN50P300X300X80-17N-S175 92.069,78.189 r0 bottom (schematic designator IC9)
IC12_VHF_FWD_RFD "MCP6291T-E/OT" SOT95P270X145-5N 108.456,67.011 r180 bottom (schematic designator IC12)
IC12_VHF_REV_RFD "MCP6291T-E/OT" SOT95P270X145-5N 108.456,82.211 r180 bottom (schematic designator IC12)
IC13 "FIN1028MX" SOIC127P600X175-8N 177.7,28.268 r180 bottom
IC14 "74HC4066PW" SOP65P640X110-14N 202.995,32.02 r180 bottom
IC15 "FIN1028MX" SOIC127P600X175-8N 177.7,19.909 r180 bottom
IC16 "24AA02E48T-I/OT" SOT95P280X145-5N 170.253,11.312 r0 bottom
IC17_VHF_FWD_RFD "MCP6291T-E/OT" SOT95P270X145-5N 99.961,67.276 r180 bottom (schematic designator IC17)
IC17_VHF_REV_RFD "MCP6291T-E/OT" SOT95P270X145-5N 98.994,82.439 r180 bottom (schematic designator IC17)
IC18 "JSW2-63DR+" MINI-CIRCUITS_MT1818 20.593,21.564 r0 top
IC20 "AD8397ARDZ" SOIC127P600X175-9N-R241X309 122.845,54.755 r270 bottom
IC21 "LTM8056IY#PBF" BGA121C127P11X11_1500X1500X512 158.23,28.2 r270 top
IC22 "LTM8056IY#PBF" BGA121C127P11X11_1500X1500X512 158.3,51.78 r270 top
IC23 "PHA-1+" MINI-CIRCUITS_DF782 33.851,14.571 r0 top
IC24_VHF_FWD_RFD "SN74LVC1G32DBVR" SOT95P280X145-5N 122.056,70.311 r180 bottom (schematic designator IC24)
IC24_VHF_REV_RFD "SN74LVC1G32DBVR" SOT95P280X145-5N 122.056,82.111 r180 bottom (schematic designator IC24)
IC25 "TPS7A4700RGWT" QFN65P500X500X100-21N-S325 43.793,22.959 r180 top
IC26 "LM75AIMM/NOPB" SOP65P490X109-8N 164.355,11.243 r180 bottom
IC27 "LM75AIMM/NOPB" SOP65P490X109-8N 164.353,15.412 r180 bottom
IC28 "MAX6033AAUT25#TG16" SOT95P280X145-6N 87.584,28.967 r270 bottom
IC29 "74LVC1GU04GW" SOT65P212X110-5N 170.665,84.372 r90 top
IC30 "LD1117DT33CTR" TO228P972X240-3N-R540X510 138.349,57.8 r90 top
IC31 "LD1117DT33CTR" TO228P972X240-3N-R540X510 138.1,44.65 r270 top
IC32 "74HC4066PW" SOP65P640X110-14N 204.4,27.1 r0 top
IC33 "MIC5219-3.3YM5" SOT95P280X145-5N 173.3,14.398 r0 top
IC34 "SYDC-20-62HP+" MINI-CIRCUITS_AH202-1 9.15,65.1 r0 top
IC35 "TLC555ID" SOIC127P600X175-8N 203.636,47.453 r270 bottom
IC36 "INA286AQDRQ1" SOIC127P600X175-8N 35.1,44.3 r180 bottom
IC37 "INA286AQDRQ1" SOIC127P600X175-8N 62.309,53 r270 bottom
IC38 "74LVC1GU04GW" SOT65P212X110-5N 168.6,27.6 r180 bottom
IC39 "74ALVC74PW" SOP65P640X110-14N 131.407,33.805 r90 bottom
IC40 "AD8397ARDZ" SOIC127P600X175-9N-R241X309 89.015,49.35 r0 bottom
IC41 "AD8397ARDZ" SOIC127P600X175-9N-R241X309 109.045,36.455 r270 bottom
IC42 "AD8397ARDZ" SOIC127P600X175-9N-R241X309 109.045,54.755 r270 bottom
IC43 "AD8397ARDZ" SOIC127P600X175-9N-R241X309 122.845,36.455 r270 bottom
IC44 "74HC4066PW" SOP65P640X110-14N 148.299,27.6 r180 bottom
IC45 "SN74LVC1G32DBVR" SOT95P280X145-5N 133.921,43.3 r0 bottom
IC47 "AD8397ARDZ" SOIC127P600X175-9N-R241X309 207.601,59.559 r0 bottom
J1 "SMA" DELOCK_65848 4,22.1 r180 top locked
J2 "SMA" DELOCK_65848 4,79.4 r180 top locked
J3 "MCX" AMPHENOL_919-383J-51A 1.5,46.4 r180 top
J7 "Mini-Fit Jr.™" MOLEX_39-30-0040 203.25,89.1 r270 top
J8 "Jack" SWITCHCRAFT_712RA 206.2,76.5 r90 top
J9 "" 3M_N2530-6002RB 191.1,41.1 r270 top
J13 "P1" AMPHENOL_10052825-101LF 210.316,9.493 r90 top locked
L1 "390nH@100MHz" IND_COILCRAFT_0805HP 38.318,13.82 r90 top
L2 "1.5uH" IND_TDK_SPM6530 30.145,51.448 r0 top
L3 "1.5uH" IND_TDK_SPM6530 37,65.338 r270 top
L4 "390nH@100MHz" IND_COILCRAFT_0805HP 108.808,34.18 r90 top
L5 "390nH@100MHz" IND_COILCRAFT_0805HP 118.608,34.18 r90 top
L6 "1000R@100MHz" INDC1608X95N 26.493,23.264 r90 top
L7 "1uH" INDC2620X100N 29.393,22.264 r270 top
L8 "1.5uH" IND_TDK_SPM6530 144.775,71.759 r0 top
L9 "1.5uH" IND_TDK_SPM6530 155.166,78.547 r270 top
L10 "1.5uH" IND_TDK_SPM6530 161.76,85.247 r90 top
L11 "1uH" INDC2620X100N 138.7,13.9 r90 top
L12 "120R@100MHz" INDC1005X55N 46.1,15.4 r270 top
L13 "100nH" IND_COILCRAFT_1812SMS 65.458,70.144 r225 top
L14 "100nH" IND_COILCRAFT_1812SMS 67.945,57.008 r45 top
L17 "100nH" IND_COILCRAFT_1812SMS 53.2,81.812 r180 top
L18 "100nH" IND_COILCRAFT_1812SMS 52.4,71.296 r90 top
LD1 "Green" LED_KINGBRIGHT_KPH-1608CGCK 140.555,78.138 r0 bottom
LD2 "Green" LED_KINGBRIGHT_KPH-1608CGCK 137.67,81.252 r90 bottom
LD3 "Red" LED_AVAGO_HSMC-C120 -1.1,17 r90 top
LD4 "Green" LED_KINGBRIGHT_KPH-1608CGCK 195.182,20.374 r180 bottom
LD5 "Green" LED_KINGBRIGHT_KPH-1608CGCK 208.695,27.719 r180 bottom
LD6 "Green" LED_KINGBRIGHT_KPH-1608CGCK 210.175,24.9 r180 bottom
LD7 "Green" LED_KINGBRIGHT_KPH-1608CGCK 132.2,53.875 r270 bottom
LD9 "Green" LED_KINGBRIGHT_KPH-1608CGCK 196.89,25.966 r90 bottom
LD11 "Green" LED_KINGBRIGHT_KPH-1608CGCK 48.693,37.595 r90 bottom
LD12 "Green" LED_KINGBRIGHT_KPH-1608CGCK 31.06,62.855 r0 bottom
LD13_VHF_FWD_RFD "Green" LED_AVAGO_HSME-C120 -1.1,27.1 r90 top (schematic designator LD13)
LD13_VHF_REV_RFD "Green" LED_AVAGO_HSME-C120 131.842,78.948 r180 bottom (schematic designator LD13)
M1 "Plated Hole" MTG300_600#1 3.527,101.743 r0 top
M2 "Plated Hole" MTG300_600#2 43.05,-22.65 r0 top
P1 "10k" TRIM_BOURNS_3224W 206.012,50.531 r90 top
P2 "10k" TRIM_BOURNS_3224W 206.012,44.17 r90 top
P3 "200k" TRIM_BOURNS_3223W 145.032,49.828 r0 top
P4 "200k" TRIM_BOURNS_3223W 147.4,45.591 r0 top
P5_VHF_FWD_RFD "10k" TRIM_BOURNS_3224W 211.85,56.03 r90 top (schematic designator P5)
P5_VHF_REV_RFD "10k" TRIM_BOURNS_3224W 211.85,49.6 r90 top (schematic designator P5)
P6 "10k" TRIM_BOURNS_3224W 200.7,53.7 r90 top
P7 "10k" TRIM_BOURNS_3224W 200.7,47.3 r90 top
P8 "10k" TRIM_BOURNS_3224W 206.012,37.81 r90 top
P9 "10k" TRIM_BOURNS_3224W 206.012,56.891 r90 top
PB1 "Switch" SW_C&K_PCM12SMTR 215.947,42.824 r90 top
PB2 "Switch" SW_C&K_PCM12SMTR 215.933,63.502 r90 top
PB3 "Push Button" PB_TYCO_1-1825027-1 0.51,38.105 r0 top
R1 "1k" RESC1005X40N 211.793,42.457 r0 top
R2 "1k" RESC1005X40N 211.793,43.614 r0 top
R3 "0" RESC1005X40N 195.7,58.84 r180 bottom
R4 "0" RESC1005X40N 195.7,54.24 r180 bottom
R5 "0" RESC1005X40N 195.7,52.14 r180 bottom
R6 "0" RESC1005X40N 195.7,47.54 r180 bottom
R7 "0" RESC1005X40N 195.7,45.54 r180 bottom
R8 "0" RESC1005X40N 195.7,42.24 r180 bottom
R9 "0" RESC1005X40N 195.7,40.94 r180 bottom
R10 "12k" RESC2012X60N 78.1,62.3 r270 top
R11 "2R7" RESC2012X60N 83.859,65.496 r180 top
R12 "9R1" RESC2012X60N 93.66,64.296 r180 top
R13 "22" RESC2012X60N 88.659,66.796 r180 top
R14 "33" RESC2012X60N 82.76,62.096 r90 top
R15 "12k" RESC2012X60N 78.1,53.2 r90 top
R16 "100" RESC1005X40N 171.6,35.5 r0 bottom
R17 "47k" RESC1608X55N 148.524,79.9 r90 bottom
R18 "2R7" RESC2012X60N 83.8,49.8 r180 top
R19 "9R1" RESC2012X60N 93.16,51.296 r180 top
R20 "22" RESC2012X60N 88.66,48.796 r180 top
R21 "33" RESC2012X60N 82.8,53.2 r270 top
R22_VHF_FWD_RFD "0" RESC1608X55N 126,69.684 r270 bottom (schematic designator R22)
R22_VHF_REV_RFD "0" RESC1608X55N 125.2,84.8 r270 bottom (schematic designator R22)
R23 "47k" RESC1005X40N 33.96,62.855 r0 bottom
R24_VHF_FWD_RFD "0" RESC1005X40N 95.387,63.079 r0 bottom (schematic designator R24)
R24_VHF_REV_RFD "0" RESC1005X40N 95.387,78.279 r0 bottom (schematic designator R24)
R25 "1M1" RESC2012X60N 7.65,91.099 r270 bottom
R26 "22k" RESC1005X40N 121.7,59.3 r0 bottom
R27_VHF_FWD_RFD "82" RESC1608X55N 85.2,61.489 r90 bottom (schematic designator R27)
R27_VHF_REV_RFD "82" RESC1608X55N 85.2,76.689 r90 bottom (schematic designator R27)
R28 "56k" RESC1608X55N 151.118,84.647 r0 bottom
R29 "10M" RESC2113X55N 70.2,5.3 r0 bottom
R30 "8k2" RESC1608X55N 148.7,83.8 r90 bottom
R31_VHF_FWD_RFD "3R9" RESC1005X40N 93.125,68.036 r270 bottom (schematic designator R31)
R31_VHF_REV_RFD "3R9" RESC1005X40N 93.125,83.236 r270 bottom (schematic designator R31)
R32_VHF_FWD_RFD "10k" RESC1005X40N 109.85,64.944 r180 bottom (schematic designator R32)
R32_VHF_REV_RFD "10k" RESC1005X40N 109.85,80.144 r180 bottom (schematic designator R32)
R33_VHF_FWD_RFD "10k" RESC1005X40N 105.6,66.5 r270 bottom (schematic designator R33)
R33_VHF_REV_RFD "10k" RESC1005X40N 105.6,81.7 r270 bottom (schematic designator R33)
R34 "100" RESC1005X40N 182.7,45.2 r270 bottom
R35 "100" RESC1005X40N 172.5,44.6 r0 bottom
R36 "100" RESC1005X40N 182.7,42.6 r270 bottom
R37 "100" RESC1005X40N 172.5,43.3 r0 bottom
R38 "100" RESC1005X40N 182.7,29.6 r270 bottom
R39 "100" RESC1005X40N 171.6,28.903 r0 bottom
R40 "1k" RESC1005X40N 130.107,39.445 r90 bottom
R41 "1k" RESC1005X40N 131.4,39.445 r270 bottom
R42 "64k9" RESC1608X55N 145.9,17.25 r270 top
R43 "100k" RESC1608X55N 145.9,20.585 r90 top
R44 "100" RESC1005X40N 182.7,21.2 r270 bottom
R45 "100" RESC1005X40N 171.6,20.5 r0 bottom
R46 "10k" RESC1005X40N 147.4,19.3 r90 top
R47 "10M" RESC2113X55N 39.4,3.65 r180 bottom
R48 "1k" RESC1005X40N 132.707,39.445 r270 bottom
R49 "10k" RESC1005X40N 148.2,33.671 r0 bottom
R50 "47k" RESC1005X40N 123,47.3 r180 bottom
R51 "100k" RESC1608X55N 196.6,9.5 r90 top
R53_VHF_FWD_RFD "12k" RESC1005X40N 104.36,65.77 r90 bottom (schematic designator R53)
R53_VHF_REV_RFD "12k" RESC1005X40N 103.8,81 r90 bottom (schematic designator R53)
R54_VHF_FWD_RFD "2k" RESC1005X40N 103.004,65.759 r90 bottom (schematic designator R54)
R54_VHF_REV_RFD "2k" RESC1005X40N 102.444,80.989 r90 bottom (schematic designator R54)
R55_VHF_FWD_RFD "22k" RESC1005X40N 215.43,55.289 r90 top (schematic designator R55)
R55_VHF_REV_RFD "22k" RESC1005X40N 215.9,50.9 r180 top (schematic designator R55)
R56_VHF_FWD_RFD "0" RESC1005X40N 103.8,69.94 r180 bottom (schematic designator R56)
R56_VHF_REV_RFD "0" RESC1005X40N 105.1,85.6 r180 bottom (schematic designator R56)
R59 "47k" RESC1005X40N 121.7,61.9 r180 bottom
R60 "22k" RESC1005X40N 123,49.9 r0 bottom
R61 "10k" RESC1005X40N 165.161,20.445 r180 bottom
R62 "100" RESC1005X40N 182.7,27 r270 bottom
R64 "22k" RESC1005X40N 83.543,49.967 r0 bottom
R65 "1k" RESC1005X40N 128.39,41.316 r90 bottom
R66 "0" RESC1608X55N 166.172,36.2 r270 top
R67 "200k" RESC1608X55N 155.14,39.81 r90 bottom
R68 "22k" RESC1005X40N 210.67,53.5 r0 bottom
R69 "42k2" RESC1608X55N 159.34,39.81 r270 bottom
R70 "6k98" RESC1608X55N 157.24,39.81 r270 bottom
R71 "0" RESC1608X55N 155.945,33.7 r180 bottom
R72 "10k" RESC1005X40N 193.8,8.3 r90 top
R73 "Undefined" RESC1608X55N 161.93,39.81 r90 bottom
R74 "Undefined" RESC1608X55N 164.1,41.926 r180 bottom
R75 "22k" RESC1005X40N 89.015,45.91 r180 bottom
R76 "0" RESC1608X55N 161.5,60.821 r0 top
R77 "200k" RESC1608X55N 162.34,62.543 r0 bottom
R78 "42k2" RESC1608X55N 153.74,63.31 r270 bottom
R79 "6k34" RESC1608X55N 161.54,65.31 r270 bottom
R80 "100" RESC1005X40N 171.6,27.6 r0 bottom
R81 "1k" RESC1005X40N 105.4,58.2 r270 bottom
R82 "100" RESC1005X40N 182.7,18.6 r270 bottom
R83 "0" RESC1608X55N 141.632,88.614 r0 top
R84 "0" RESC1608X55N 159.44,63.31 r270 bottom
R85 "200" RESC1608X55N 207.32,36.603 r0 bottom
R86 "Undefined" RESC1608X55N 155.645,63.41 r90 bottom
R87 "Undefined" RESC1608X55N 156.4,66.6 r180 bottom
R88 "22k" RESC1005X40N 207.514,55.9 r270 bottom
R89 "22k" RESC1005X40N 203.297,61.752 r270 bottom
R90 "1k" RESC1005X40N 108.7,47.3 r270 bottom
R91 "1k" RESC1005X40N 131.4,27.8 r270 bottom
R92 "0" RESC1005X40N 195.7,35.64 r180 bottom
R93 "22k" RESC1005X40N 203.297,59.744 r270 bottom
R94 "47k" RESC1005X40N 112.3,60 r90 bottom
R95 "50" RESC1608X55N 23.293,25.664 r0 top
R96 "47k" RESC1005X40N 113.1,52.9 r0 bottom
R97 "3k3" RESC1608X55N 163.16,71.947 r180 top
R99 "0" RESC1608X55N 25.193,20.639 r180 top
R101 "0" RESC2012X60N 119.808,15.38 r0 top
R102 "150" RESC1608X55N 110.319,25.34 r0 top
R103 "150" RESC1608X55N 117.214,25.34 r180 top
R105 "1k" RESC1005X40N 132.7,27.8 r90 bottom
R106 "3k3" RESC1608X55N 143.956,78.137 r0 bottom
R108 "" RESC1005X40N 205.295,27.72 r0 bottom value=1k
R109 "" RESC1005X40N 206.8,24.9 r0 bottom value=1k
R110 "" RESC1005X40N 132.2,50.5 r90 bottom value=1k
R111_VHF_FWD_RFD "787" RESC2012X60N 24.3,58.5 r0 top (schematic designator R111)
R111_VHF_REV_RFD "787" RESC2012X60N 22.286,63.3 r0 top (schematic designator R111)
R112_VHF_FWD_RFD "53R6" RESC2012X60N 21.586,57.573 r90 top (schematic designator R112)
R112_VHF_REV_RFD "53R6" RESC2012X60N 19.586,62.2 r90 top (schematic designator R112)
R113_VHF_FWD_RFD "53R6" RESC2012X60N 26.9,57.5 r90 top (schematic designator R113)
R113_VHF_REV_RFD "53R6" RESC2012X60N 24.886,62.3 r90 top (schematic designator R113)
R114 "0" RESC1608X55N 56.51,26.981 r180 top
R115 "0" RESC1608X55N 169.865,81.572 r180 top
R120 "0R005" RES_OHMITE_LVK25 45.7,48.4 r180 bottom
R121 "0" RESC2012X60N 34,38.5 r270 bottom
R122 "0" RESC2012X60N 36.4,38.5 r270 bottom
R123 "0R005" RES_OHMITE_LVK25 45.396,55.228 r180 bottom
R124 "0" RESC2012X60N 68.109,51.7 r0 bottom
R125 "0" RESC2012X60N 68.109,54.1 r0 bottom
R126 "0" RESC1608X55N 144.06,63.816 r0 top
R127 "150" RESC1608X55N 18.298,16.974 r0 top
R130 "0" RESC1608X55N 37.363,24.159 r90 top
R131 "0" RESC1608X55N 39.163,24.159 r270 top
R134 "36" RESC1608X55N 19.893,15.334 r0 top
R137 "150" RESC1608X55N 22.093,14.584 r90 top
R140 "22" RESC1005X40N 198.6,29.1 r180 top
R141 "22" RESC1005X40N 198.6,27.1 r180 top
R142 "22" RESC1005X40N 199.6,8.31 r270 bottom
R143 "22" RESC1005X40N 210.6,25.15 r0 top
R144 "22" RESC1005X40N 210.57,27.1 r0 top
R145 "10k" RESC1005X40N 201.651,37.253 r270 bottom
R146 "2k7" RESC1608X55N 206.801,39.753 r0 bottom
R147 "5k6" RESC1005X40N 204.271,39.553 r270 bottom
R148 "10k" RESC1005X40N 203.001,39.553 r270 bottom
R149 "10k" RESC1005X40N 201.651,39.553 r270 bottom
R150 "1k6" RESC1005X40N 204.201,42.253 r270 bottom
R151 "0" RESC1005X40N 195.7,38.94 r180 bottom
R152 "1k6" RESC1005X40N 203.001,42.253 r270 bottom
R153 "10k" RESC1005X40N 196.137,9.575 r270 bottom
R154 "0" RESC1005X40N 205.501,52.753 r90 bottom
R155 "10k" RESC1005X40N 203.001,52.753 r270 bottom
R157 "0" RESC1608X55N 137.732,88.614 r0 top
R158 "100" RESC1005X40N 171.6,36.766 r0 bottom
R169 "100" RESC1005X40N 171.59,19.284 r0 bottom
R171 "10k" RESC1005X40N 168.253,25.26 r0 bottom
R178_VHF_FWD_RFD "1k" RESC1005X40N 128.609,66.032 r0 bottom (schematic designator R178)
R178_VHF_REV_RFD "1k" RESC1005X40N 128.636,78.897 r0 bottom (schematic designator R178)
R179 "10k" RESC1005X40N 195.587,26.336 r270 bottom
R180 "47k" RESC1005X40N 48.693,40.487 r90 bottom
R184 "22k" RESC1005X40N 83.543,48.715 r180 bottom
R185 "1k6" RESC1005X40N 131.6,24.7 r0 bottom
R186 "22k" RESC1005X40N 83.543,47.445 r180 bottom
R187 "3k3" RESC1005X40N 131.6,25.9 r180 bottom
R188 "22k" RESC1005X40N 83.543,51.255 r180 bottom
R189 "22k" RESC1005X40N 124.75,61.1 r270 bottom
R190 "22k" RESC1005X40N 127.8,51.6 r90 bottom
R191 "22k" RESC1005X40N 123.48,61.1 r90 bottom
R192 "22k" RESC1005X40N 126.5,51.6 r270 bottom
R193 "22k" RESC1005X40N 93.799,50.8 r90 bottom
R194 "22k" RESC1005X40N 107.6,62.2 r0 bottom
R195 "22k" RESC1005X40N 107.1,60 r90 bottom
R196 "22k" RESC1005X40N 111,60 r90 bottom
R197 "22k" RESC1005X40N 95.1,50.8 r270 bottom
R198 "22k" RESC1005X40N 109.7,60 r90 bottom
R199 "22k" RESC1005X40N 108.5,60 r90 bottom
R200 "22k" RESC1005X40N 110.1,41.2 r180 bottom
R202 "22k" RESC1005X40N 122.2,42.9 r90 bottom
R203 "22k" RESC1005X40N 121.7,41.2 r0 bottom
R204 "22k" RESC1005X40N 109.7,42.9 r90 bottom
R205 "22k" RESC1005X40N 111.2,49.4 r0 bottom
R206 "22k" RESC1005X40N 109.2,49.4 r0 bottom
R207 "22k" RESC1005X40N 113.1,54.1 r0 bottom
R208 "22k" RESC1005X40N 113.1,51.7 r0 bottom
R209 "22k" RESC1005X40N 111.4,31.8 r180 bottom
R211 "22k" RESC1005X40N 113.1,55.3 r0 bottom
R212 "22k" RESC1005X40N 110.5,30.5 r180 bottom
R213 "22k" RESC1005X40N 124.7,30 r90 bottom
R214 "22k" RESC1005X40N 125.2,31.7 r0 bottom
R216 "3k3" RESC1608X55N 137.67,84.927 r90 bottom
R218 "10k" RESC1005X40N 192.542,19.904 r270 bottom
R235 "0" RESC1005X40N 195.7,57.54 r180 bottom
R236 "0" RESC1005X40N 195.7,55.54 r180 bottom
R241 "0" RESC1005X40N 195.7,50.74 r180 bottom
R242 "0" RESC1005X40N 195.7,48.84 r180 bottom
R243 "0" RESC1005X40N 195.7,44.24 r180 bottom
R247 "0" RESC1005X40N 195.7,37.64 r180 bottom
R248 "0" RESC1005X40N 195.7,34.34 r180 bottom
T1 "Trans Ideal" Balun_5961000601 27.773,79.448 r0 top
T2 "MRF101BN" TO-220-HFLIP 75.56,48.424 r180 top
T3 "MRF101AN" TO-220-HFLIP 75.66,66.868 r0 top
T4 "Trans Ideal" Balun_5961000601_power 54.466,48.692 r270 top
T6 "SI4425DDY-T1-GE3" SOIC127P600X175-8N 189.8,7.6 r270 top
T7 "BSS138LT1G" SOT95P240X110-3N 195,6.1 r180 top
TP1 "Test Point" TPS127 146.745,77.384 r90 bottom
TP3 "Test Point" TPS127 202.195,27.72 r270 bottom
TP4 "Test Point" TPS127 203.7,24.9 r270 bottom
TP5 "Test Point" TPS127 132.2,47.4 r0 bottom
TP6 "Test Point" TPS127 87.7,84.45 r180 bottom
TP7 "Test Point" TPS127 86.915,67.386 r270 bottom
TP8_VHF_FWD_RFD "Test Point" TPS127 128.105,68.884 r90 bottom (schematic designator TP8)
TP8_VHF_REV_RFD "Test Point" TPS127 126.89,82.061 r90 bottom (schematic designator TP8)
TP9 "Test Point" TPS127 36.26,62.855 r90 bottom
TP10 "Test Point" TPS127 48.693,42.76 r90 bottom
TP11 "Test Point" TPS127 162.302,75.709 r90 bottom
TP12 "Test Point" TPS127 202.692,22.03 r90 bottom
TP13 "Test Point" NICOMATIC_C12000B 165.651,18.312 r0 bottom
TP16 "Test Point" TPS127 133.9,85.722 r180 bottom
TP18 "Test Point" TPS127 190.768,19.905 r180 bottom
TP20 "Test Point" TPS127 69.994,25.644 r90 bottom
TP21 "Test Point" TPS127 67.734,48.424 r90 bottom
TP22 "Test Point" TPS127 199.7,24.9 r0 bottom
TP23 "Test Point" TPS127 199.7,22 r0 bottom
TP24 "Test Point" NICOMATIC_C12000B 158.36,71.947 r0 top
TP25 "Test Point" TPS127 141.695,22.585 r90 bottom
TP26 "Test Point" TPS127 168.7,23.5 r90 bottom
TP27 "Test Point" TPS127 107.155,41.841 r90 bottom
TP28 "Test Point" TPS127 118.065,70.672 r90 bottom
TP29 "Test Point" TPS127 115.1,32.618 r90 bottom
TP31 "Test Point" TPS127 109.82,70.9 r0 bottom
TP32 "Test Point" TPS127 109.806,87.2 r0 bottom
TP33 "Test Point" TPS127 104.35,62.536 r90 bottom
TP34 "Test Point" TPS127 103.794,78.189 r90 bottom
TR3 "1:1.5" XFMR_MINI-CIRCUITS_TT1618 113.958,18.38 r180 top
WASHER1 "Custom 3D printed" Keystone_7687 -2.6,22.1 r180 top
WASHER2 "Custom 3D printed" Keystone_7687 -2.489,79.4 r180 top

## Footprints (in the part's own frame and the unit in brackets; to place one, negate y for a bottom-side part, rotate by r counter-clockwise, add the part's x,y. Pads: shape width x height; smd on the part's side, far side on the other; paste and mask are expansions set on the pad)
3M_N2530-6002RB [mm] "30 Contacts - Straight .100\" x .100\" Low Profile Four-Wall Header"
  round 1.7 hole 1: 1(-17.78,-1.27) 2(-17.78,1.27) 3(-15.24,-1.27) 4(-15.24,1.27) 5(-12.7,-1.27) 6(-12.7,1.27) 7(-10.16,-1.27) 8(-10.16,1.27) 9(-7.62,-1.27) 10(-7.62,1.27) 11(-5.08,-1.27) 12(-5.08,1.27) 13(-2.54,-1.27) 14(-2.54,1.27) 15(0,-1.27) 16(0,1.27) 17(2.54,-1.27) 18(2.54,1.27) 19(5.08,-1.27) 20(5.08,1.27) 21(7.62,-1.27) 22(7.62,1.27) 23(10.16,-1.27) 24(10.16,1.27) 25(12.7,-1.27) 26(12.7,1.27) 27(15.24,-1.27) 28(15.24,1.27) 29(17.78,-1.27) 30(17.78,1.27)
  silkscreen extent -22.71,-4.85 22.71,4.52, body extent -22.71,-4.11 22.71,4.52, height 9.91
AMPHENOL_919-383J-51A [mm] "50 Ohm, RF Connector, MCX Right Angle PCB Receptacle Jack"
  round 1.9 hole 1.2: 1(0,0)
  round 2.4 hole 1.7: 2(-2.54,2.54) 2(-2.54,-2.54) 2(2.54,2.54) 2(2.54,-2.54)
  silkscreen extent -3,-3 6.5,3, body extent -3,-3 6.5,3, height 6
AMPHENOL_10052825-101LF [mm] "72 Contacts, 2mm Pitch, 6 Columns, 4 Pairs per Column, 4 Walls, Right Angle Header"
  round 1.1 hole 0.5: A1(-5,-7.65) A2(-3,-7.75) A3(-1,-7.65) A4(1,-7.75) A5(3,-7.65) A6(5,-7.75) B1(-5,-6.25) B2(-3,-6.35) B3(-1,-6.25) B4(1,-6.35) B5(3,-6.25) B6(5,-6.35) C1(-5,-4.85) C2(-3,-4.95) C3(-1,-4.85) C4(1,-4.95) C5(3,-4.85) C6(5,-4.95) D1(-5,-3.45) D2(-3,-3.55) D3(-1,-3.45) D4(1,-3.55) D5(3,-3.45) D6(5,-3.55) E1(-5,-2.05) E2(-3,-2.15) E3(-1,-2.05) E4(1,-2.15) E5(3,-2.05) E6(5,-2.15) F1(-5,-0.65) F2(-3,-0.75) F3(-1,-0.65) F4(1,-0.75) F5(3,-0.65) F6(5,-0.75) G1(-5,0.75) G2(-3,0.65) G3(-1,0.75) G4(1,0.65) G5(3,0.75) G6(5,0.65) H1(-5,2.15) H2(-3,2.05) H3(-1,2.15) H4(1,2.05) H5(3,2.15) H6(5,2.05) I1(-5,3.55) I2(-3,3.45) I3(-1,3.55) I4(1,3.45) I5(3,3.55) I6(5,3.45) J1(-5,4.95) J2(-3,4.85) J3(-1,4.95) J4(1,4.85) J5(3,4.95) J6(5,4.85) K1(-5,6.35) K2(-3,6.25) K3(-1,6.35) K4(1,6.25) K5(3,6.35) K6(5,6.25) L1(-5,7.75) L2(-3,7.65) L3(-1,7.75) L4(1,7.65) L5(3,7.75) L6(5,7.65)
  silkscreen extent -6.95,-21.95 6.95,11.85, body extent -6.95,-21.95 6.95,11.85, height 15.25
Balun_5961000601 [mil]
  round 82 hole 42: 1(490,120) 2(-495,120) 3(490,-120) 4(-495,-120)
  silkscreen extent -414,-414 414,414, body extent -435,-435 435,435, height 539
Balun_5961000601_power [mil]
  round 82 hole 42: 1(-430,-270) 2(-430,290) 3(-480,-125) 4(-480,140)
  silkscreen extent -414,-414 414,414, body extent -435,-435 435,435, height 539
BGA121C127P11X11_1500X1500X512 [mm] "BGA,1.27mm Pitch, Square;121 Pin, 11 Columns X 11 Rows, 15.00mm X 15.00mm X 5.12mm H"
  round 0.65 smd: A1(-6.35,6.35) A2(-5.08,6.35) A3(-3.81,6.35) A4(-2.54,6.35) A5(-1.27,6.35) A6(0,6.35) A7(1.27,6.35) A8(2.54,6.35) A9(3.81,6.35) A10(5.08,6.35) A11(6.35,6.35) B1(-6.35,5.08) B2(-5.08,5.08) B3(-3.81,5.08) B4(-2.54,5.08) B5(-1.27,5.08) B6(0,5.08) B7(1.27,5.08) B8(2.54,5.08) B9(3.81,5.08) B10(5.08,5.08) B11(6.35,5.08) C1(-6.35,3.81) C2(-5.08,3.81) C3(-3.81,3.81) C4(-2.54,3.81) C5(-1.27,3.81) C6(0,3.81) C7(1.27,3.81) C8(2.54,3.81) C9(3.81,3.81) C10(5.08,3.81) C11(6.35,3.81) D1(-6.35,2.54) D2(-5.08,2.54) D3(-3.81,2.54) D4(-2.54,2.54) D5(-1.27,2.54) D6(0,2.54) D7(1.27,2.54) D8(2.54,2.54) D9(3.81,2.54) D10(5.08,2.54) D11(6.35,2.54) E1(-6.35,1.27) E2(-5.08,1.27) E3(-3.81,1.27) E4(-2.54,1.27) E5(-1.27,1.27) E6(0,1.27) E7(1.27,1.27) E8(2.54,1.27) E9(3.81,1.27) E10(5.08,1.27) E11(6.35,1.27) F1(-6.35,0) F2(-5.08,0) F3(-3.81,0) F4(-2.54,0) F5(-1.27,0) F6(0,0) F7(1.27,0) F8(2.54,0) F9(3.81,0) F10(5.08,0) F11(6.35,0) G1(-6.35,-1.27) G2(-5.08,-1.27) G3(-3.81,-1.27) G4(-2.54,-1.27) G5(-1.27,-1.27) G6(0,-1.27) G7(1.27,-1.27) G8(2.54,-1.27) G9(3.81,-1.27) G10(5.08,-1.27) G11(6.35,-1.27) H1(-6.35,-2.54) H2(-5.08,-2.54) H3(-3.81,-2.54) H4(-2.54,-2.54) H5(-1.27,-2.54) H6(0,-2.54) H7(1.27,-2.54) H8(2.54,-2.54) H9(3.81,-2.54) H10(5.08,-2.54) H11(6.35,-2.54) J1(-6.35,-3.81) J2(-5.08,-3.81) J3(-3.81,-3.81) J4(-2.54,-3.81) J5(-1.27,-3.81) J6(0,-3.81) J7(1.27,-3.81) J8(2.54,-3.81) J9(3.81,-3.81) J10(5.08,-3.81) J11(6.35,-3.81) K1(-6.35,-5.08) K2(-5.08,-5.08) K3(-3.81,-5.08) K4(-2.54,-5.08) K5(-1.27,-5.08) K6(0,-5.08) K7(1.27,-5.08) K8(2.54,-5.08) K9(3.81,-5.08) K10(5.08,-5.08) K11(6.35,-5.08) L1(-6.35,-6.35) L2(-5.08,-6.35) L3(-3.81,-6.35) L4(-2.54,-6.35) L5(-1.27,-6.35) L6(0,-6.35) L7(1.27,-6.35) L8(2.54,-6.35) L9(3.81,-6.35) L10(5.08,-6.35) L11(6.35,-6.35)
  silkscreen extent -8.22,-7.5 7.5,7.5, body extent -7.5,-7.5 7.5,7.5, height 5.21
CAPC1005X50N [mm] "Chip Capacitor, Body 1.0x0.55mm, IPC Medium Density"
  rect 0.57x0.68 smd: 1(-0.49,0) 2(0.49,0)
  body extent -0.5,-0.27 0.5,0.28, height 0.5
CAPC1005X55N [mm] "Capacitor, Non-Polarized, Chip; 1.00mm L X 0.50mm W X 0.70mm H, IPC Medium Density"
  rect 0.62x0.62 smd: 1(-0.45,0) 2(0.45,0)
  body extent -0.52,-0.27 0.53,0.28, height 0.55
CAPC1608X87N [mm] "Chip Capacitor, Body 1.6x0.8mm IPC Medium Density"
  rect 0.95x1 smd: 1(-0.8,0) 2(0.8,0)
  body extent -0.87,-0.47 0.88,0.48, height 0.87
CAPC1608X90N [mm] "Chip Capacitor, Body 1.6x0.8mm IPC Medium Density"
  rect 0.95x0.95 smd: 1(-0.75,0) 2(0.75,0)
  body extent -0.85,-0.45 0.85,0.45, height 0.9
CAPC1709X95N [mm] "Capacitor, non-Polarized, Chip; 1.65mm L X 0.85mm W X 0.95mm H,IPC Medium Density"
  rect 0.95x1 smd: 1(-0.75,0) 2(0.75,0)
  body extent -0.87,-0.47 0.88,0.48, height 0.95
CAPC2012X135N [mm] "Chip Capacitor, Body 2.0x1.25mm, IPC Medium Density"
  rect 1.05x1.4 smd: 1(-0.9,0) 2(0.9,0)
  silkscreen extent 0,-0.58 0,0.58, body extent -1.05,-0.67 1.05,0.68, height 1.25
CAPC3216X180N [mm] "Chip Capacitor, Body 3.2x1.6mm, IPC Medium Density"
  rect 1.15x1.8 smd: 1(-1.5,0) 2(1.5,0)
  silkscreen extent -0.55,-0.8 0.55,0.8, body extent -1.7,-0.9 1.7,0.9, height 1.8
CAPC3225X280N [mm] "Chip Capacitor, Body 3.2x2.5mm, IPC Medium Density"
  rect 1.1x2.8 smd: 1(-1.5,0) 2(1.5,0)
  silkscreen extent -0.6,-1.25 0.6,1.25, body extent -1.7,-1.35 1.7,1.35, height 2.8
DELOCK_65848 [mm] "50 Ohm Through Hole SMA Right Angle PCB Jack"
  round 2.1 hole 1.4: 1(0,0)
  round 2.2 hole 1.5: 2(-2.54,2.54) 2(-2.54,-2.54) 2(2.54,2.54) 2(2.54,-2.54)
  silkscreen extent -3,-5.1 19.1,5.1, body extent -3.04,-3.17 18.96,3.09, height 9.15
DIOM5336X265N [mm] "DO-214-AA/SMB Diode, Molded Body; 5.34mm L X 3.625mm W X 2.65mm H, IPC Medium Density"
  rect 2.3x2.15 smd: 1(-2.15,0) 2(2.15,0)
  silkscreen extent -3.92,-1.8 2.65,1.8, body extent -2.7,-1.95 2.7,1.95, height 2.4
FIDUCIAL_TOP_C100-200 [mm] "Round Fiducial Target, Top Layer, 1.0mm, Top Solder 2.0mm, Keepout =2.0mm"
  round 1 smd paste-0.51 mask+0.5: FTG2(0,0)
  Top Layer keep-out circle w0.1: c0,0 r1
FIDUCIAL_TOP_S100-200 [mm] "Square Fiducial Target, Top Layer, 1.0mm, Top Solder 2.0mm, Keepout =2.0mm"
  rect 1x1 smd rot 45 paste-0.51 mask+0.5: 1(0,0)
  Top Layer keep-out region: 1.414,0 0,-1.414 -1.414,0 0,1.414
FIL_MURATA_BNX02 [mm] "Block Type EMIFIL LC Combined Type, BNX02* Series"
  rect 3.8x2.5 smd: 1(-6.85,2.1) 2(6.85,2.1) 3(-6.85,-2.2) 4(6.85,-2.2)
  rect 7.9x2.3 smd: 4(1,-5.1)
  rect 3.4x2.3 smd: 4(3.25,5.1)
  silkscreen extent -5.95,-4.45 7.77,5.05, body extent -6.05,-4.55 6.05,4.55, height 3.1